# Altium PCB DSP大板子.PcbDoc (part 1 of 9)
Units mil, origin at the board's own origin, x right, y up, seen from the top; angles counter-clockwise.
Board outline 7874.02 x 9055.12 mil, 4 copper layers (Top Layer, GND02, PWR03, Bottom Layer), stack 23.756 mil thick; 656 components, 360 nets, 1967 pads, 2623 vias.
Unrouted connection lines stored in the file: 70.
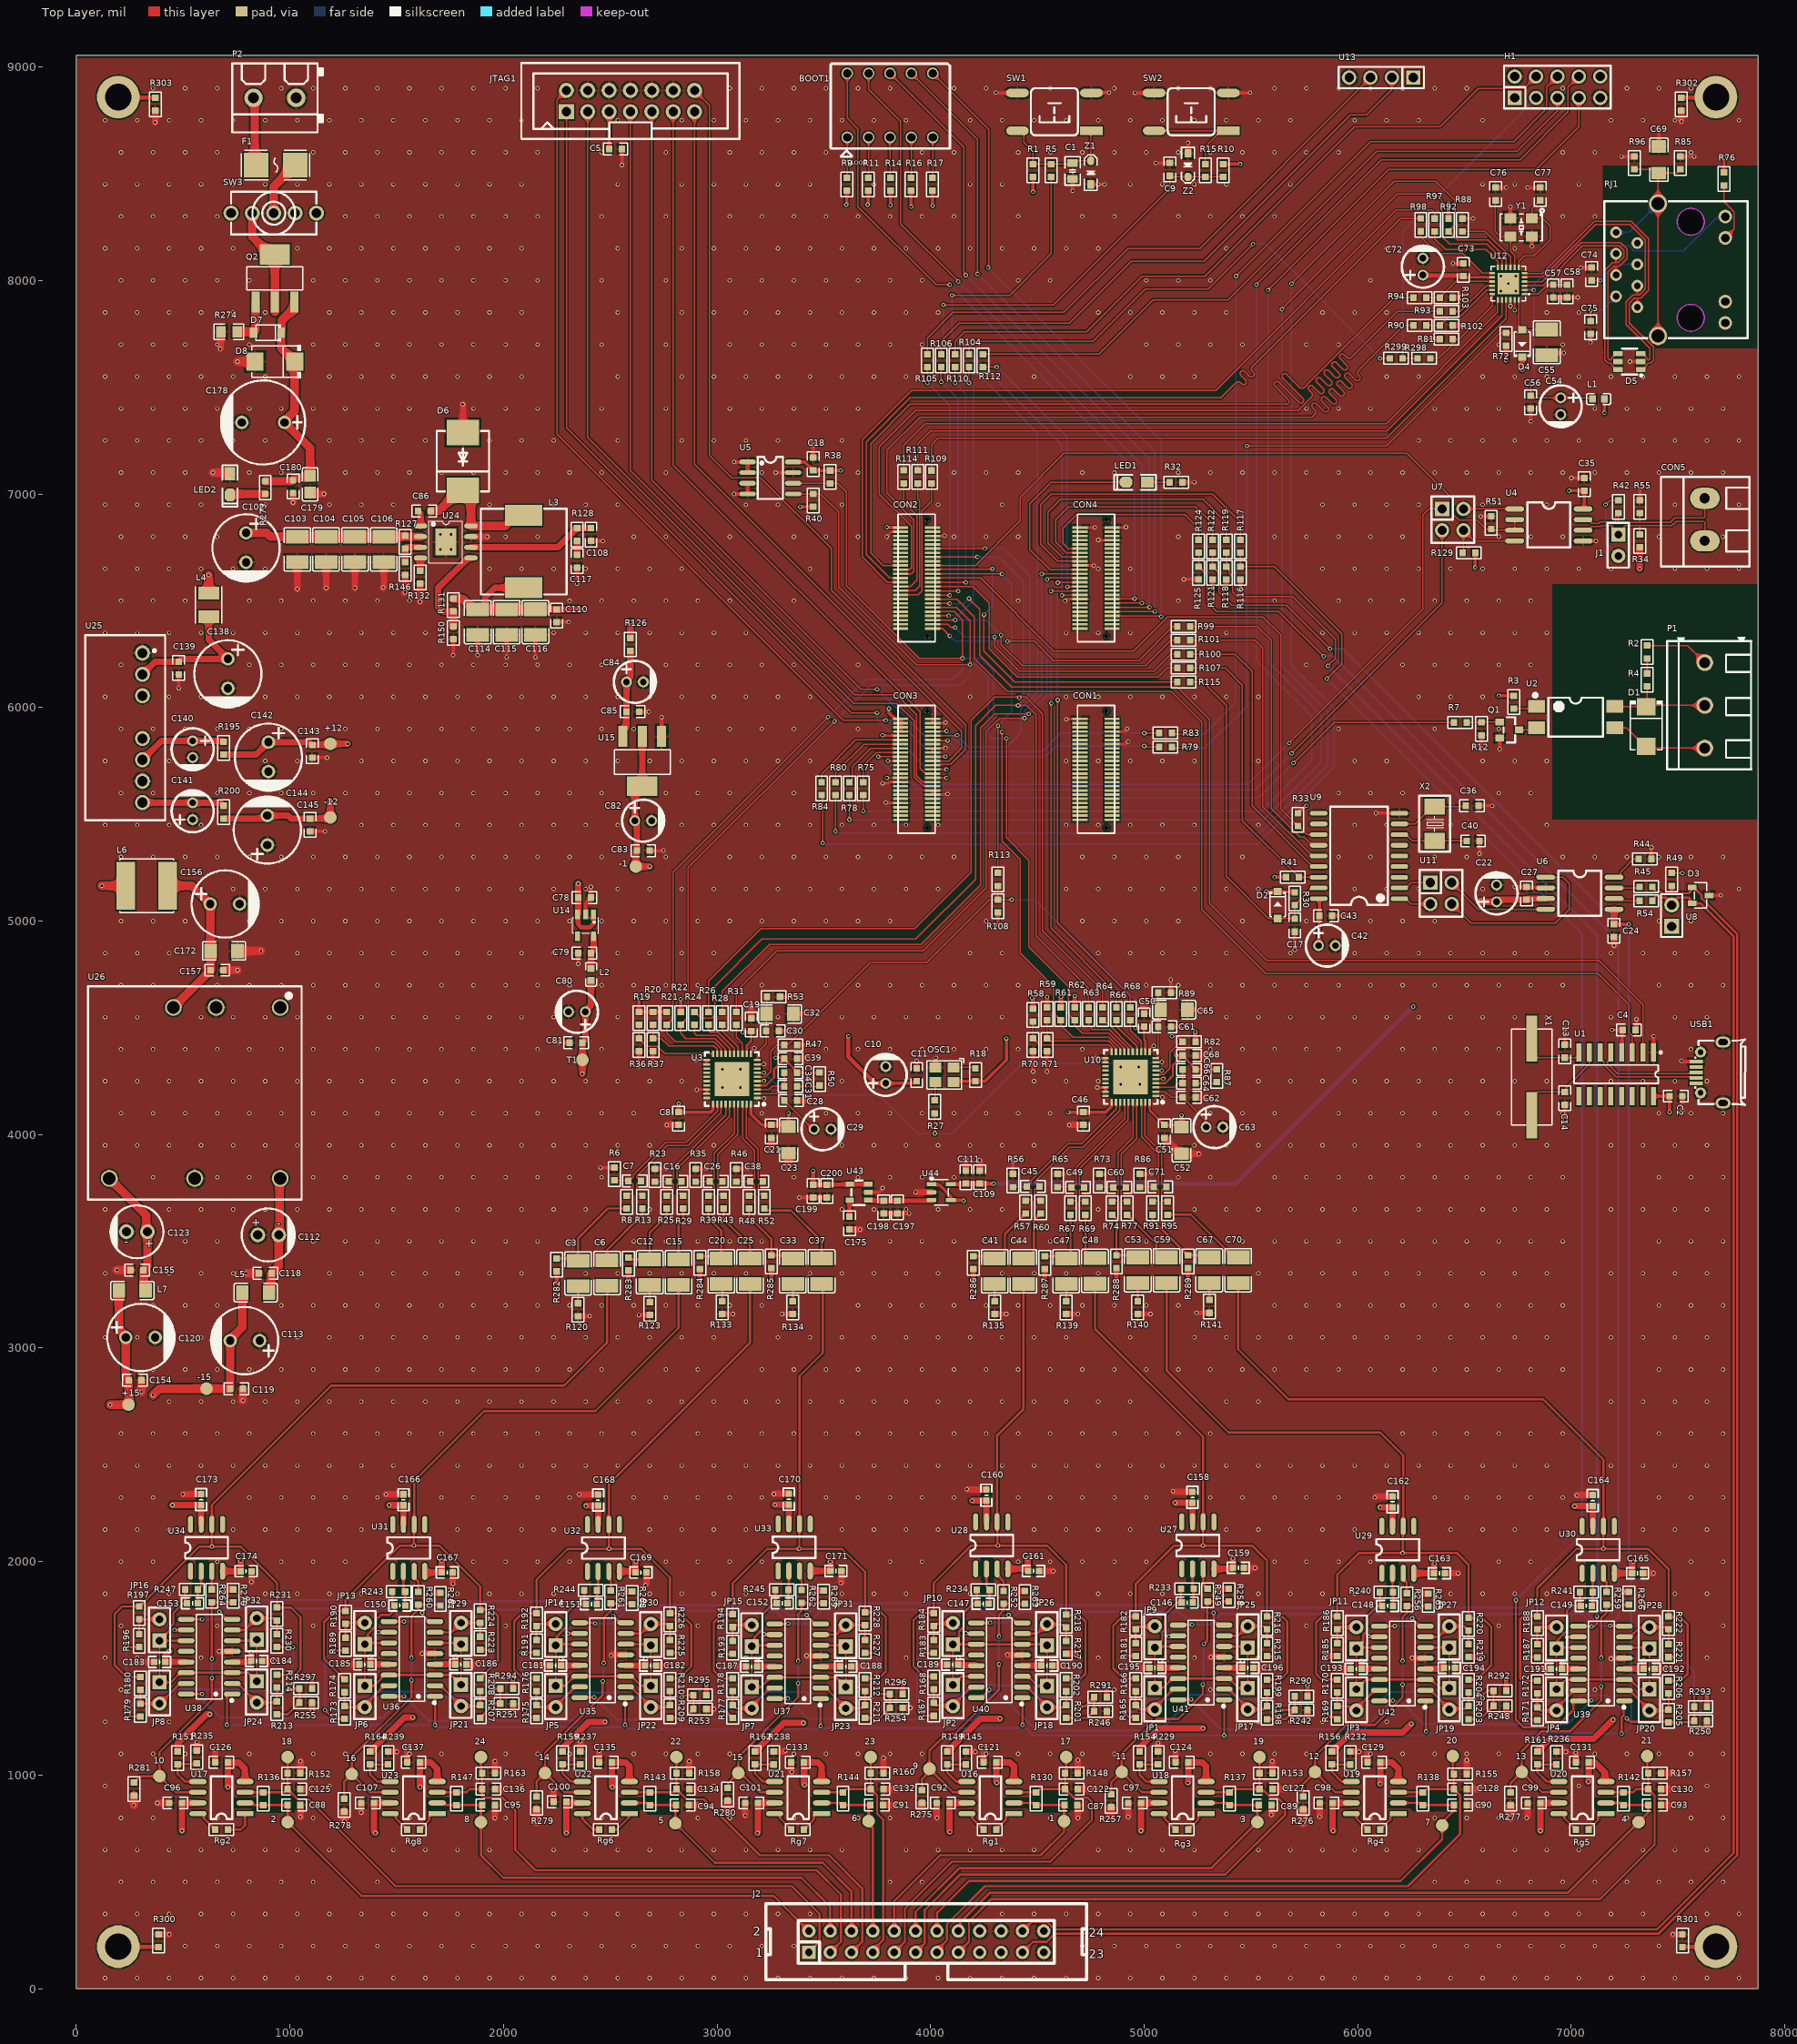
[diagram p0: Top Layer view]
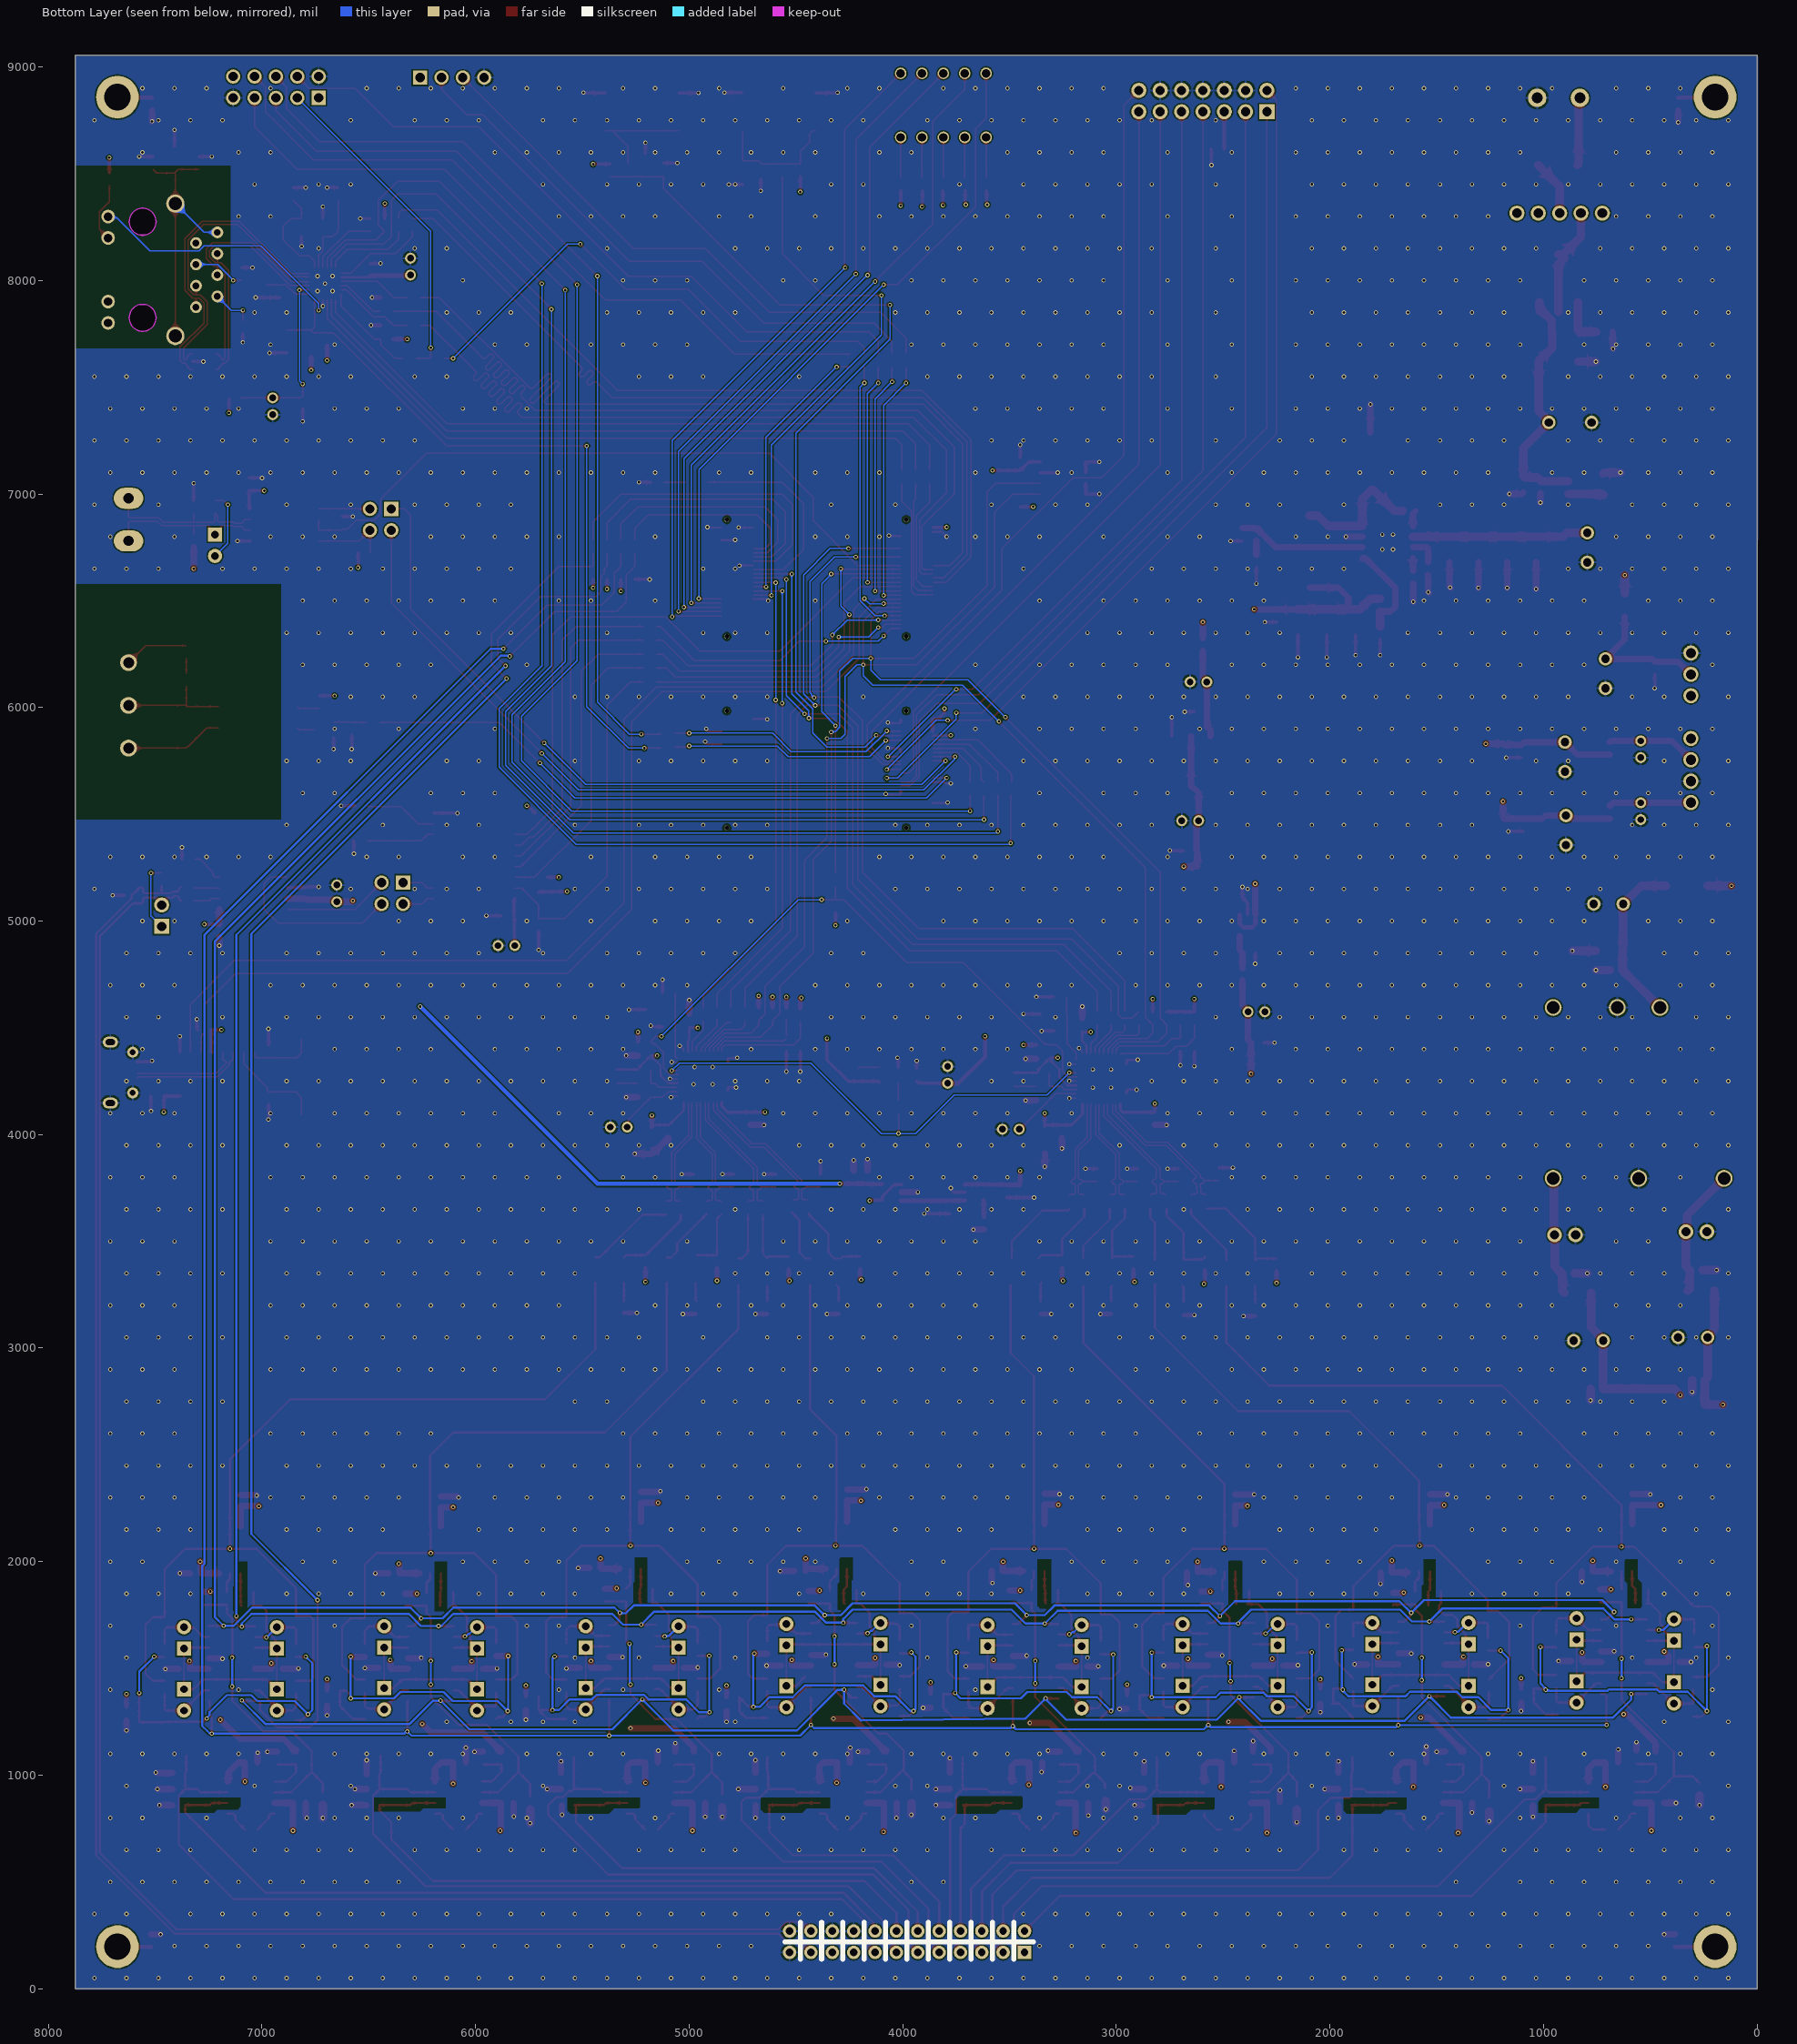
[diagram p1: Bottom Layer view, seen from below]
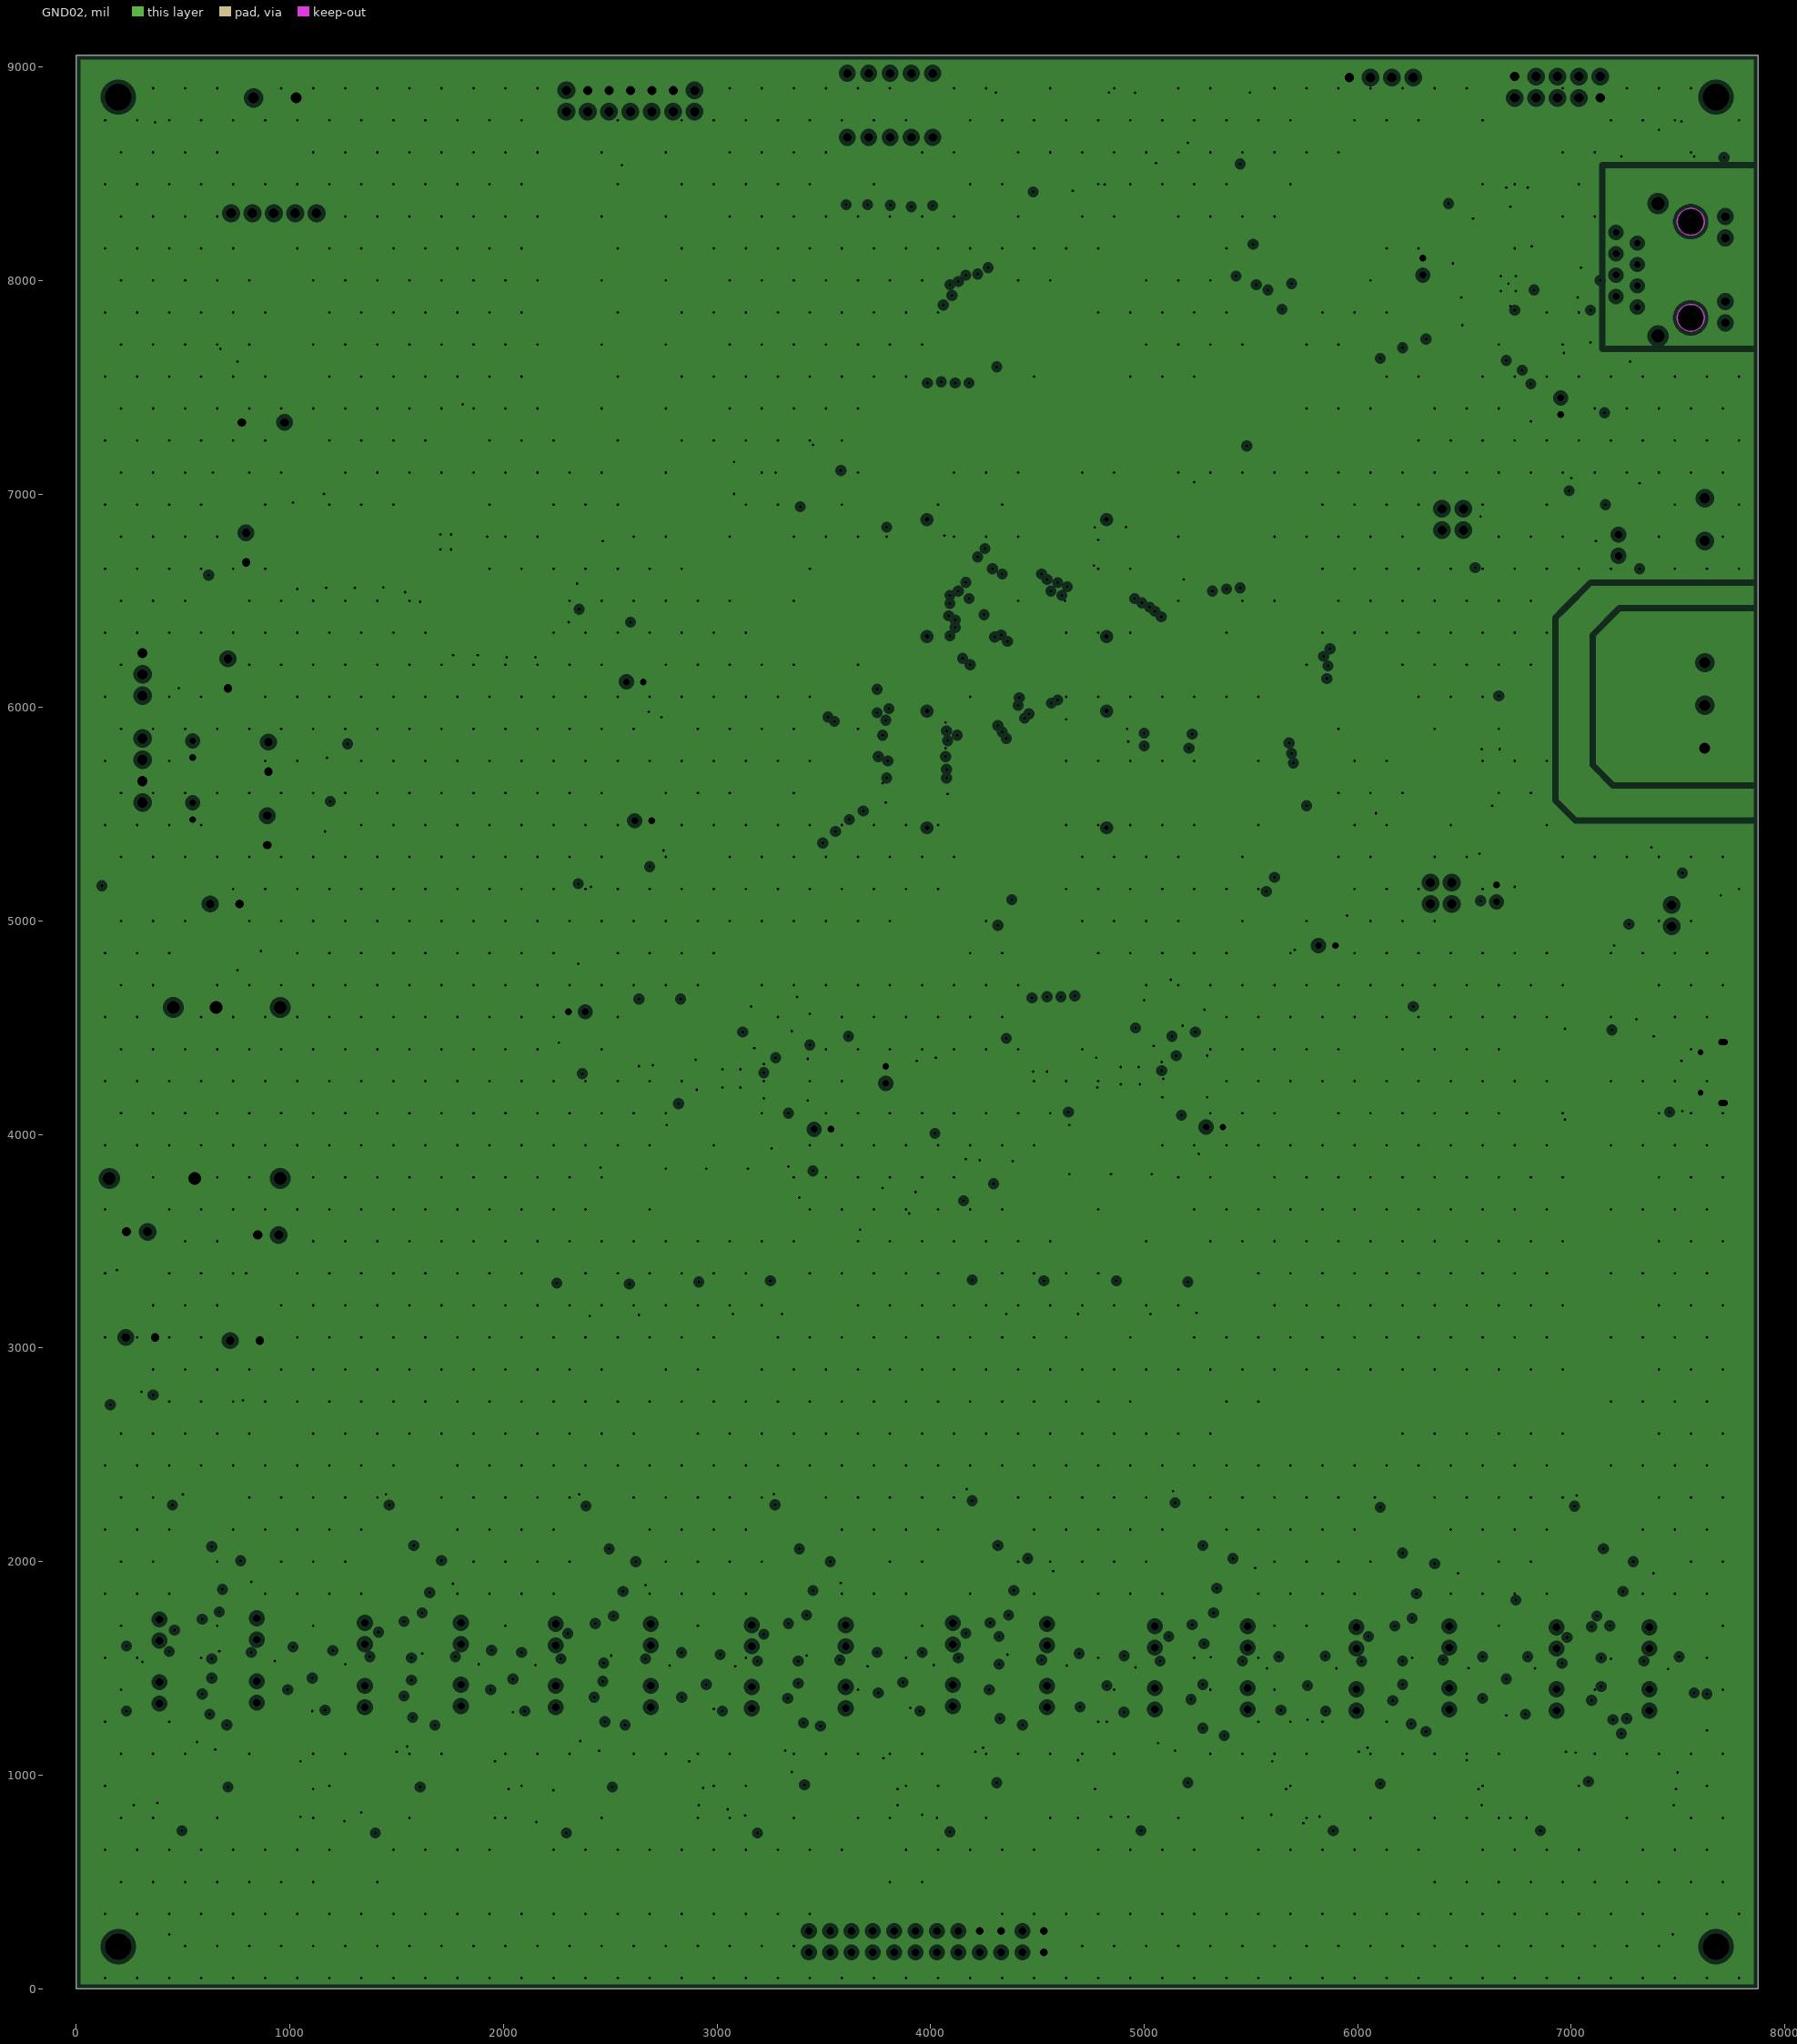
[diagram p2: GND02, clearances drawn from the general rule]
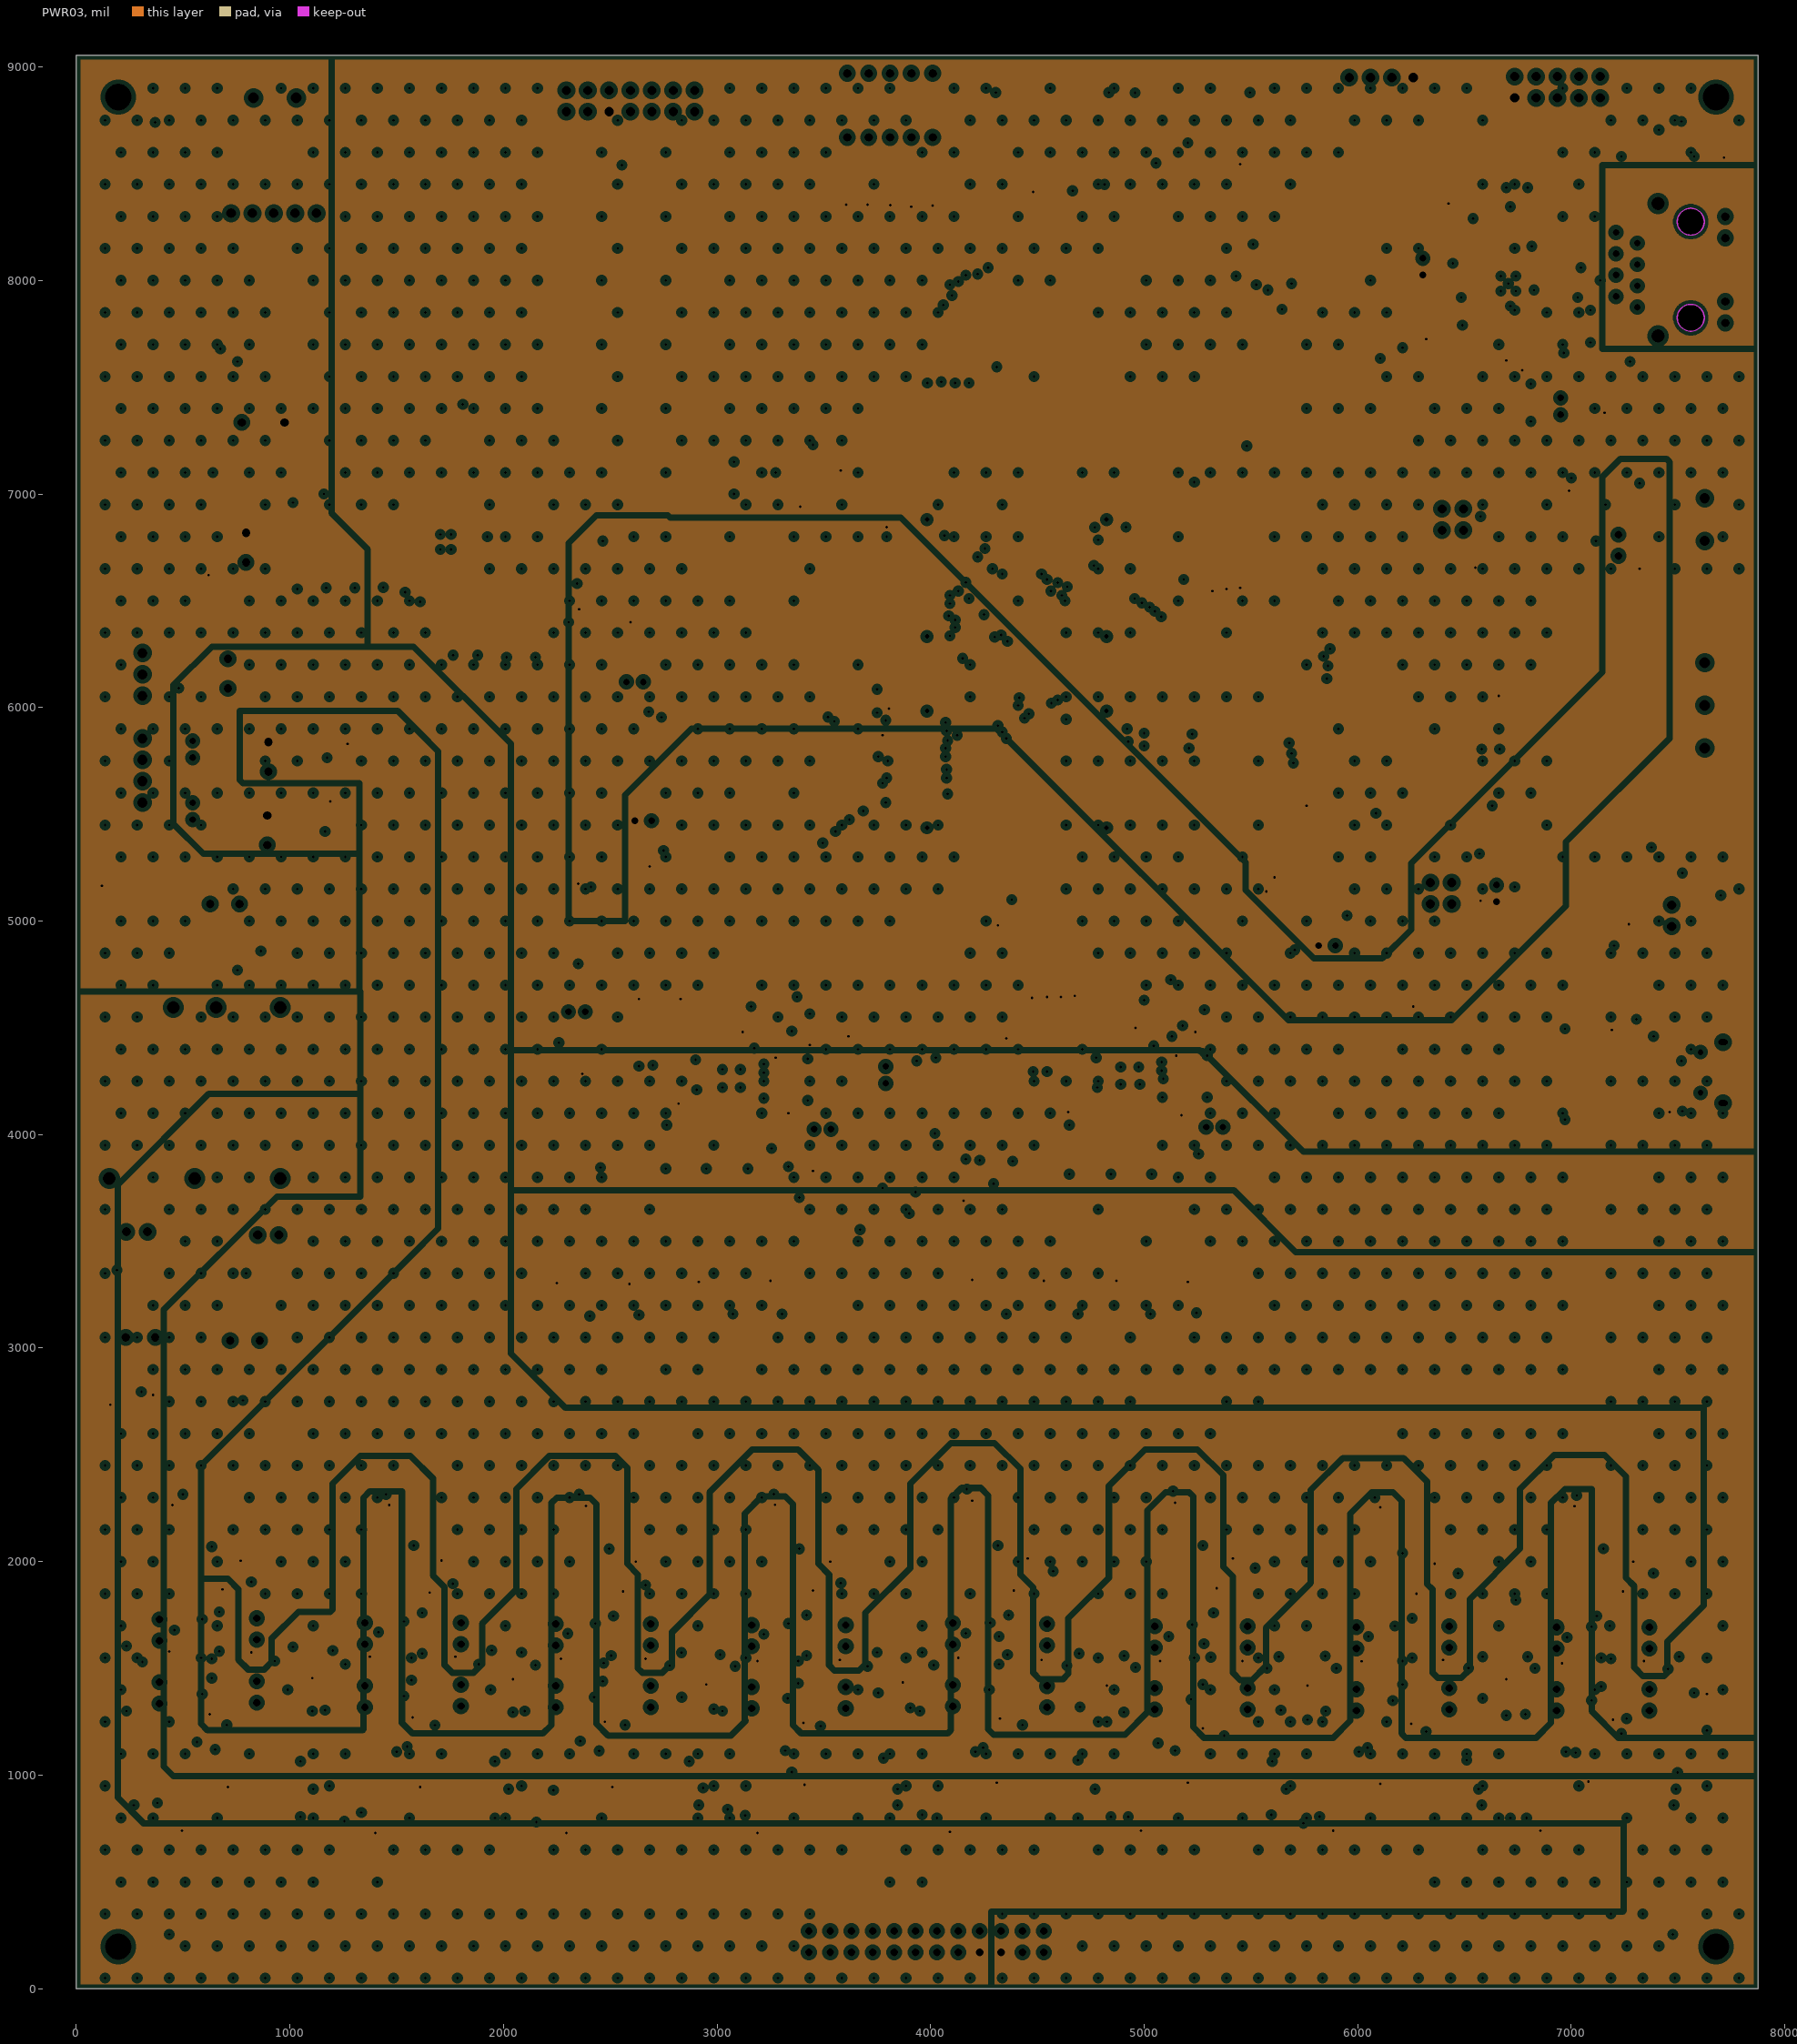
[diagram p3: PWR03, clearances drawn from the general rule]

## Layer stack, top to bottom
Top Solder: solder mask 0.4, Solder Resist, Dk 3.5
Top Layer: signal copper 1.4
Dielectric 2: prepreg 2.8, PP-006, Dk 4.1
GND02: plane copper 1.378, net (Multiple Nets)
Dielectric 1: dielectric 12.6, FR-4, Dk 4.8
PWR03: plane copper 1.378, net (Multiple Nets)
Dielectric 3: prepreg 2.8, PP-006, Dk 4.1
Bottom Layer: signal copper 1.4
Bottom Solder: solder mask 0.4, Solder Resist, Dk 3.5

## Board outline
0,0 7874.02,0 7874.02,9055.12 0,9055.12

## Design rules (kind name [scope] priority, off if disabled: settings)
Clearance [All] p1: gap=6 ignorepadtopadclearanceinfootprint=TRUE except(10: Arc-Hole Track-Hole SMDPad-Hole THPad-Hole Via-Hole Fill-Hole Poly-Hole Region-Hole Text-Hole)
ComponentClearance [All] p1: gap=0 collisioncheckmode=3 verticalgap=0 showdistances=FALSE
DiffPairsRouting [All] p1: maxlimit=10 minlimit=10 mostfreqgap=10 toplayer_minwidth=6 toplayer_maxwidth=15 toplayer_prefwidth=15 bottomlayer_minwidth=6 bottomlayer_maxwidth=15 bottomlayer_prefwidth=15 maxuncoupledlength=500
HoleSize [All] p1: absolutevalues=TRUE maxlimit=100 minlimit=12 maxpercent=80.000 minpercent=20.000
HoleToHoleClearance [All] p1: gap=0 allowstackedmicrovias=TRUE
MinimumSolderMaskSliver [All] p1: minsoldermaskwidth=0
PlaneClearance [All] p1: clearance=20
PlaneConnect [All] p1: planeconnectstyle=Relief reliefexpansion=20 reliefentries=4 reliefconductorwidth=10 reliefairgap=10
PolygonConnect [All] p1: thpad.connectstyle=Relief thpad.reliefconductorwidth=10 thpad.reliefentries=4 thpad.polygonreliefangle="90 Angle" thpad.airgapwidth=10 smdpad.connectstyle=Relief smdpad.reliefconductorwidth=10 smdpad.reliefentries=4 smdpad.polygonreliefangle="90 Angle" smdpad.airgapwidth=10 via.connectstyle=Direct via.reliefconductorwidth=10 via.reliefentries=4 via.polygonreliefangle="90 Angle" via.airgapwidth=10
RoutingVias [All] p1: holewidth=12 width=20 viastyle="Through Hole" minholewidth=12 minwidth=20 maxholewidth=28 maxwidth=50
SilkToSilkClearance [All] p1: silktosilkclearance=0
SilkToSolderMaskClearance [IsPad] p1: minsilkscreentomaskgap=0 clearancetoexposedcopper=TRUE
SolderMaskExpansion [All] p1: expansion=4 istentingtop=FALSE
SupplyNets "Schematic Supply Nets_9" [InNet('VBIAS_1V5_RAW')] p1: voltage=0.000
SupplyNets "Schematic Supply Nets_4" [InNet('VBIAS_1V5')] p2: voltage=0.000
SupplyNets "Schematic Supply Nets_8" [InNet('GND')] p3: voltage=0.000
SupplyNets "Schematic Supply Nets_7" [InNet('+15V')] p4: voltage=0.000
SupplyNets "Schematic Supply Nets_6" [InNet('+5V_SYS')] p5: voltage=0.000
SupplyNets "Schematic Supply Nets_5" [InNet('-12V')] p6: voltage=0.000
SupplyNets "Schematic Supply Nets_3" [InNet('AVDD')] p7: voltage=0.000
SupplyNets "Schematic Supply Nets_2" [InNet('-15V')] p8: voltage=0.000
SupplyNets "Schematic Supply Nets_1" [InNet('IOVDD')] p9: voltage=0.000
SupplyNets "Schematic Supply Nets" [InNet('+12V')] p10: voltage=0.000
UnRoutedNet [All] p1: checkbadconnections=TRUE
Width [All] p1: maxlimit=300 minlimit=6 preferedwidth=10
20 further rules are at their usual default settings.

## Classes and differential pairs
differential pair AIN8: +AIN8_P -AIN8_N
differential pair AIN7: +AIN7_P -AIN7_N
differential pair AIN6: +AIN6_P -AIN6_N
differential pair AIN5: +AIN5_P -AIN5_N
differential pair AIN4: +AIN4_P -AIN4_N
differential pair AIN3: +AIN3_P -AIN3_N
differential pair AIN2: +AIN2_P -AIN2_N
differential pair AIN1: +AIN1_P -AIN1_N

## Components (designator, comment, footprint, x,y, rotation, side; value= is the part's Value field where it differs from the comment)
1 "TEST POINT" TEST 4625,785 r90 top
2 "TEST POINT" TEST 990,780 r90 top
3 "TEST POINT" TEST 5530,780 r90 top
4 "TEST POINT" TEST 7315,780 r90 top
5 "TEST POINT" TEST 2805,775 r90 top
6 "TEST POINT" TEST 3710,785 r90 top
7 "TEST POINT" TEST 6395,765 r270 top
8 "TEST POINT" TEST 1895,780 r90 top
9 "TEST POINT" TEST 3995,1030 r90 top
10 "TEST POINT" TEST 390,995 r0 top
11 "TEST POINT" TEST 4895,1015 r0 top
12 "TEST POINT" TEST 5800,1015 r0 top
13 "TEST POINT" TEST 6767.76,1015 r0 top
14 "TEST POINT" TEST 2195,1010 r0 top
15 "TEST POINT" TEST 3100,1010 r0 top
16 "TEST POINT" TEST 1290,1005 r0 top
17 "TEST POINT" TEST 4635,1085 r0 top
18 "TEST POINT" TEST 990,1085 r0 top
19 "TEST POINT" TEST 5540,1085 r0 top
20 "TEST POINT" TEST 6445,1090 r0 top
21 "TEST POINT" TEST 7355,1090 r0 top
22 "TEST POINT" TEST 2810,1085 r0 top
23 "TEST POINT" TEST 3720,1085 r0 top
24 "TEST POINT" TEST 1895,1085 r0 top
+12 "TEST POINT" TEST 1190,5830 r90 top
+15 "TEST POINT" TEST 245,2735 r90 top
-1 "TEST POINT" TEST 2620,5255 r270 top
-12 "TEST POINT" TEST 1190,5485 r90 top
-15 "TEST POINT" TEST 610,2810 r90 top
BOOT1 "5BIT 2.54MM DIP Switch" CON_5PIN_DIP_2D54 3812,8814 r180 top
C1 "0.1uF" "C 0805_L" 4665,8512.6 r90 top
C2 "0.1uf" 0603C 7489.92,4180 r0 top
C3 "10uF" C1210 2350,3350 r270 top
C4 "0.1uf" 0603C 7270,4490 r0 top
C5 "0.1uf" 0603C 2525,8615 r0 top
C6 "10uF/0Ω" C1210 2485.31,3351.35 r90 top value=10uF
C7 "DNP" 0603C 2615,3782.78 r180 top
C8 "0.1uf" 0603C 2820,4075 r90 top
C9 "DNP_10nF" 0603C 5120,8519.92 r270 top
C10 "10uF" 5x11mm 3790,4280 r90 top
C11 "0.1uf" 0603C 3935,4280 r270 top
C12 "10uF" C1210 2685,3355 r270 top
C13 "22pf" 0603C 6970,4389.92 r270 top
C14 "22pf" 0603C 6970,4170 r90 top
C15 "10uF/0Ω" C1210 2820,3355.3 r270 top value=10uF
C16 "DNP" 0603C 2804.92,3780 r180 top
C17 "0.1uF" 0603C 5705,4979.92 r90 top
C18 "0.1uf" 0603C 3450,7139.92 r90 top
C19 "0.1uf" 0603C 3160,4515 r90 top
C20 "10uF" C1210 3019.84,3360 r270 top
C21 "0.1uf" 0603C 3255,4014.92 r90 top
C22 "10u" 5x11mm 6650,5130 r90 top
C23 "10uF" C1206#1 3335,3975 r90 top
C24 "0.1u" 0603C 7200,4955 r270 top value=104
C25 "10uF/0Ω" C1210 3155.1,3360 r270 top value=10uF
C26 "DNP" 0603C 2994.92,3780 r180 top
C27 "0.1u" 0603C 6790,5129.92 r90 top value=104
C28 "0.1uf" 0603C 3345.08,4160 r0 top
C29 "10uF" 5x11mm 3495,4025 r0 top
C30 "0.1uf" 0603C 3260,4485 r180 top
C31 "5600pf" 0603C 3345,4225 r0 top
C32 "10uF" C1206#1 3295,4565 r180 top
C33 "10uF" C1210 3354.84,3360 r270 top
C34 "390pf" 0603C 3345,4290 r0 top
C35 "0.1uF" 0603C 7060,7045 r270 top
C36 "33pF" 0603C 6534.92,5540 r0 top
C37 "10uF/0Ω" C1210 3489.61,3360 r270 top value=10uF
C38 "DNP" 0603C 3184.76,3780 r180 top
C39 "0.1uf" 0603C 3345,4355 r0 top
C40 "33pF" 0603C 6540,5375 r0 top
C41 "10uF" C1210 4300,3360 r270 top
C42 "10u" 5x11mm 5856.26,4885 r0 top
C43 "0.1u" 0603C 5850.08,5025 r0 top value=104
C44 "10uF/0Ω" C1210 4435,3360 r270 top value=10uF
C45 "DNP" 0603C 4479.78,3757.78 r180 top
C46 "0.1uf" 0603C 4715,4075 r270 top
C47 "10uF" C1210 4635,3360 r270 top
C48 "10uF/0Ω" C1210 4770,3361.43 r270 top value=10uF
C49 "DNP" 0603C 4689.57,3752.78 r180 top
C50 "0.1uf" 0603C 5000,4534.92 r90 top
C51 "0.1uf" 0603C 5095,4014.92 r270 top
C52 "10uF" C1206#1 5175,3972.7 r90 top
C53 "10uF" C1210 4970,3365 r270 top
C54 "22u" 5x11mm 6950,7410 r270 top
C55 "10uF" C1210 6885,7710.2 r90 top
C56 "0.1u" 0603C 6810,7430 r270 top value=104
C57 "2.2u" 0603C 6915,7949.92 r90 top value=104
C58 "0.1u" 0603C 6980,7950 r90 top value=104
C59 "10uF/0Ω" C1210 5105,3365 r270 top value=10uF
C60 "DNP" 0603C 4884.57,3752.78 r180 top
C61 "0.1uf" 0603C 5095,4505 r180 top
C62 "0.1uf" 0603C 5210,4175 r0 top
C63 "10uF" 5x11mm 5330,4035 r0 top
C64 "5600pf" 0603C 5210,4240 r0 top
C65 "10uF" C1206#1 5140,4585 r180 top
C66 "390pf" 0603C 5210,4305 r0 top
C67 "10uF" C1210 5305,3365 r270 top
C68 "0.1uf" 0603C 5210,4370 r0 top
C69 "1nF/2kV" C1206#1 7410,8565 r270 top value=10uF
C70 "10uF/0Ω" C1210 5440,3365 r270 top value=10uF
C71 "DNP" 0603C 5075,3755 r180 top
C72 "22u" 5x11mm 6305,8065 r90 top
C73 "0.1u" 0603C 6495,8050 r90 top value=104
C74 "0.1u" 0603C 7095,8030 r90 top value=104
C75 "0.1u" 0603C 7090,7780.08 r270 top value=104
C76 "18pF" 0603C 6645,8404.92 r270 top
C77 "18pF" 0603C 6854.64,8404.92 r270 top
C78 "4.7uf" 0603C 2380,5110 r180 top
C79 "4.7uf" 0603C 2380,4850 r0 top
C80 "10uF" 5x11mm 2343.74,4575 r180 top
C81 "0.1uf" 0603C 2340,4430 r0 top
C82 "10u" 5x11mm 2655,5470 r0 top
C83 "0.1u" 0603C 2654.92,5330 r0 top value=104
C84 "10u" 5x11mm 2616.26,6120 r0 top
C85 "0.1u" 0603C 2605.08,5980 r0 top value=104
C86 "0.1uf" 0603C 1630.08,6920 r0 top
C87 "104" 0603C 4657.1,860 r0 top
C88 "104" 0603C 1020,860 r0 top
C89 "104" 0603C 5566.37,860 r0 top
C90 "104" 0603C 6480,860 r0 top
C91 "104" 0603C 3747.82,860 r0 top
C92 "104" 0603C 4058.53,870 r180 top
C93 "104" 0603C 7390.08,860 r0 top
C94 "104" 0603C 2838.55,860 r0 top
C95 "104" 0603C 1930,860 r0 top
C96 "104" 0603C 465,870 r180 top
C97 "104" 0603C 4955.66,870 r180 top
C98 "104" 0603C 5852.79,870 r180 top
C99 "104" 0603C 6824.92,870 r180 top
C100 "104" 0603C 2264.26,875 r180 top
C101 "104" 0603C 3161.39,870 r180 top
C102 "47uF" CAP-TH_BD8.0-P3.50-D0.6-FD 795,6748.9 r270 top
C103 "2.2uF" C1210 1035,6740 r270 top
C104 "2.2uF" C1210 1170,6740 r270 top
C105 "2.2uF" C1210 1305,6740 r270 top
C106 "2.2uF" C1210 1440,6740 r270 top
C107 "104" 0603C 1365,870 r180 top
C108 "47pf" 0603C 2410,6809.92 r90 top
C109 "100nf" 0603C 4230,3800 r270 top
C110 "0.1uf" 0603C 2250,6430.08 r90 top
C111 "1uf" 0603C 4165,3800 r270 top
C112 "10uF" CAP-TH_BD6.3-P2.50-D0.6-FD 899.21,3530 r0 top
C113 "100uF" CAP-TH_BD8.0-P3.50-D0.6-FD_1 790,3035 r180 top
C114 "47uF" C1210 1880,6399.8 r270 top value=2.2uF
C115 "47uF" C1210 2015,6400 r270 top value=2.2uF
C116 "47uF" C1210 2150,6400.3 r270 top value=2.2uF
C117 "4.7nf" 0603C 2345,6684.92 r90 top
C118 "0.1uf" 0603C 885,3350 r180 top
C119 "0.1uf" 0603C 750,2810 r0 top
C120 "100uF" CAP-TH_BD8.0-P3.50-D0.6-FD_1 301.1,3050 r0 top
C121 "104" 0603C 4277.19,1060 r0 top
C122 "104" 0603C 4659.95,935 r180 top
C123 "10uF" CAP-TH_BD6.3-P2.50-D0.6-FD 284.21,3545 r180 top
C124 "104" 0603C 5176.48,1060 r0 top
C125 "104" 0603C 1020,935 r180 top
C126 "104" 0603C 680,1060 r0 top
C127 "104" 0603C 5569.94,935 r180 top
C128 "104" 0603C 6479.93,935 r180 top
C129 "104" 0603C 6075.78,1060 r0 top
C130 "104" 0603C 7389.92,935 r180 top
C131 "104" 0603C 7050.61,1060 r0 top
C132 "104" 0603C 3749.97,935 r180 top
C133 "104" 0603C 3377.89,1060 r0 top
C134 "104" 0603C 2839.98,935 r180 top
C135 "104" 0603C 2478.59,1060 r0 top
C136 "104" 0603C 1929.99,935 r180 top
C137 "104" 0603C 1579.3,1060 r0 top
C138 "100uF" CAP-TH_BD8.0-P3.50-D0.6-FD 710,6158.9 r270 top
C139 "0.1uf" 0603C 480,6185 r270 top
C140 "10u" 5x11mm 545,5803.74 r270 top
C141 "10u" 5x11mm 545,5515 r90 top
C142 "47uF" CAP-TH_BD8.0-P3.50-D0.6-FD 900,5768.9 r270 top
C143 "0.1uf" 0603C 1105,5795 r270 top
C144 "47uF" CAP-TH_BD8.0-P3.50-D0.6-FD 895,5425 r90 top
C145 "0.1uf" 0603C 1095,5449.92 r270 top
C146 "404" "C 0603_L" 5201.42,1808.23 r180 top
C147 "404" "C 0603_L" 4246.27,1803.23 r180 top
C148 "404" "C 0603_L" 6139.9,1792.93 r180 top
C149 "404" "C 0603_L" 7070.01,1793.01 r180 top
C150 "404" "C 0603_L" 1515,1795 r180 top
C151 "404" "C 0603_L" 2412.89,1800.54 r180 top
C152 "404" "C 0603_L" 3305.6,1805 r180 top
C153 "404" "C 0603_L" 545,1805.08 r180 top
C154 "0.1uf" 0603C 275,2850 r180 top
C155 "0.1uf" 0603C 284.92,3365 r0 top
C156 "100uF" CAP-TH_BD8.0-P3.50-D0.6-FD_1 696.1,5080 r0 top
C157 "0.1uf" 0603C 660,4770 r0 top
C158 "104" "C 0603_L" 5226.48,2301.09 r270 top
C159 "104" "C 0603_L" 5441.48,1971.09 r180 top
C160 "104" "C 0603_L" 4261.62,2311.09 r270 top
C161 "104" "C 0603_L" 4481.62,1956.09 r180 top
C162 "104" "C 0603_L" 6162.82,2280.62 r270 top
C163 "104" "C 0603_L" 6382.82,1945.62 r180 top
C164 "104" "C 0603_L" 7100.61,2285.62 r270 top
C165 "104" "C 0603_L" 7310.01,1945.62 r180 top
C166 "104" "C 0603_L" 1531.93,2289.67 r270 top
C167 "104" "C 0603_L" 1736.93,1949.07 r180 top
C168 "104" "C 0603_L" 2443.44,2288.47 r270 top
C169 "104" "C 0603_L" 2643.44,1949.07 r180 top
C170 "104" "C 0603_L" 3336.39,2292.01 r270 top
C171 "104" "C 0603_L" 3556.99,1956.41 r180 top
C172 "4.7uF" C1206#2 692.3,4860 r180 top
C173 "104" "C 0603_L" 585,2290.08 r270 top
C174 "104" "C 0603_L" 795,1955.08 r180 top
C175 "100nf" 0603C 3620,3584.92 r270 top
C178 "220uF" CAP-TH_BD10.0-P5.00-D1.0-FD 875,7335 r180 top
C179 "1uF" C0805 1095,7045 r90 top
C180 "0.1uf" 0603C 1015,7035 r270 top
C181 "104" "C 0603_L" 2244.35,1513.53 r0 top
C182 "104" "C 0603_L" 2689.35,1513.53 r180 top
C183 "104" "C 0603_L" 390,1530 r0 top
C184 "104" "C 0603_L" 844.4,1535 r180 top
C185 "104" "C 0603_L" 1350.63,1518.63 r0 top
C186 "104" "C 0603_L" 1800.63,1518.63 r180 top
C187 "104" "C 0603_L" 3162.3,1508.17 r0 top
C188 "104" "C 0603_L" 3602.9,1508.17 r180 top
C189 "104" "C 0603_L" 4104.16,1517.85 r0 top
C190 "104" "C 0603_L" 4544.76,1512.85 r180 top
C191 "104" "C 0603_L" 6930.6,1497.62 r0 top
C192 "104" "C 0603_L" 7365,1497.62 r180 top
C193 "104" "C 0603_L" 5992.93,1497.7 r0 top
C194 "104" "C 0603_L" 6428.53,1502.7 r180 top
C195 "104" "C 0603_L" 5050.07,1502.85 r0 top
C196 "104" "C 0603_L" 5485.07,1502.85 r180 top
C197 "100nf" 0603C 3845,3660 r90 top
C198 "1uf" 0603C 3780,3660 r90 top
C199 "1uf" 0603C 3450,3734.92 r90 top
C200 "100nf" 0603C 3515,3735 r90 top
CON1 "" NLWBS05-50C-2.2H 15647.8,27106.3 r180 top
CON2 "" NLWBS05-50C-2.2H 14807.64,28002.36 r180 top
CON3 "" NLWBS05-50C-2.2H 14807.64,27106.3 r180 top
CON4 "" NLWBS05-50C-2.2H 15647.8,28002.36 r180 top
CON5 "HDR-1X2" KF128-5.08-2P 7625,6880 r90 top
D1 "smbj33a_c224019" SMB_L4.6-W3.6-LS5.3-RD 7350,5910 r270 top
D2 "1n4148w_c7420318" SOD-123_L2.7-W1.6-LS3.7-FD 5625,5075 r90 top
D3 "pesd2can,215" SOT-23-3_L2.9-W1.3-P1.90-LS2.4-BR 7605,5120 r180 top
D4 "1n4148w_c7420318" SOD-123_L2.7-W1.6-LS3.7-FD 6770,7705 r270 top
D5 "tpd4e1u06dbvr" SOT-23-6_L2.9-W1.6-P0.95-LS2.8-BR 7271.85,7620 r0 top
D6 "b560c-13-f" SMC_L7.1-W6.2-LS8.1-RD 1810.58,7152.96 r90 top
D7 "bzt52c12-7-f" SOD-123_L2.7-W1.6-LS3.7-RD 895,7755 r180 top
D8 "smbj33a_c224019" SMB_L4.6-W3.6-LS5.3-RD 930,7620 r180 top
F1 "0451003.mrl" FUSE-SMD_L6.1-W2.7 933.27,8540 r0 top
H1 "a254up-zs05p" HDR-TH_10P-P2.54-V-M-R2-C5-S2.54 6935,8905 r0 top
J1 "1X2PIN" HDR2.54-Y-LI-2P 7220,6760 r270 top
J2 "Header 2X12" IDC2.54-LI-2x12P 3430,170 r0 top
JP1 "HDR-1X2" HDR2.54-Y-LI-2P 5050.07,1357.85 r270 top
JP2 "HDR-1X2" HDR2.54-Y-LI-2P 4104.76,1372.85 r270 top
JP3 "HDR-1X2" HDR2.54-Y-LI-2P 5993.53,1352.7 r270 top
JP4 "HDR-1X2" HDR2.54-Y-LI-2P 6930.6,1352.62 r270 top
JP5 "HDR-1X2" HDR2.54-Y-LI-2P 2244.95,1368.53 r270 top
JP6 "HDR-1X2" HDR2.54-Y-LI-2P 1351.23,1368.63 r270 top
JP7 "HDR-1X2" HDR2.54-Y-LI-2P 3162.9,1363.17 r270 top
JP8 "HDR-1X2" HDR2.54-Y-LI-2P 390,1385 r270 top
JP9 "HDR-1X2" HDR2.54-Y-LI-2P 5050.07,1647.85 r90 top
JP10 "HDR-1X2" HDR2.54-Y-LI-2P 4104.76,1662.85 r90 top
JP11 "HDR-1X2" HDR2.54-Y-LI-2P 5993.53,1642.7 r90 top
JP12 "HDR-1X2" HDR2.54-Y-LI-2P 6930.6,1642.62 r90 top
JP13 "HDR-1X2" HDR2.54-Y-LI-2P 1351.23,1663.63 r90 top
JP14 "HDR-1X2" HDR2.54-Y-LI-2P 2244.95,1658.53 r90 top
JP15 "HDR-1X2" HDR2.54-Y-LI-2P 3162.9,1653.17 r90 top
JP16 "HDR-1X2" HDR2.54-Y-LI-2P 390,1680 r90 top
JP17 "HDR-1X2" HDR2.54-Y-LI-2P 5485.07,1357.85 r270 top
JP18 "HDR-1X2" HDR2.54-Y-LI-2P 4544.76,1367.85 r270 top
JP19 "HDR-1X2" HDR2.54-Y-LI-2P 6428.53,1357.7 r270 top
JP20 "HDR-1X2" HDR2.54-Y-LI-2P 7365.6,1352.62 r270 top
JP21 "HDR-1X2" HDR2.54-Y-LI-2P 1801.23,1373.63 r270 top
JP22 "HDR-1X2" HDR2.54-Y-LI-2P 2689.95,1368.53 r270 top
JP23 "HDR-1X2" HDR2.54-Y-LI-2P 3602.9,1363.17 r270 top
JP24 "HDR-1X2" HDR2.54-Y-LI-2P 845,1390 r270 top
JP25 "HDR-1X2" HDR2.54-Y-LI-2P 5485.07,1647.85 r90 top
JP26 "HDR-1X2" HDR2.54-Y-LI-2P 4544.76,1657.85 r90 top
JP27 "HDR-1X2" HDR2.54-Y-LI-2P 6428.53,1647.7 r90 top
JP28 "HDR-1X2" HDR2.54-Y-LI-2P 7365.6,1642.62 r90 top
JP29 "HDR-1X2" HDR2.54-Y-LI-2P 1801.23,1663.63 r90 top
JP30 "HDR-1X2" HDR2.54-Y-LI-2P 2689.95,1658.53 r90 top
JP31 "HDR-1X2" HDR2.54-Y-LI-2P 3602.9,1653.17 r90 top
JP32 "HDR-1X2" HDR2.54-Y-LI-2P 845,1685 r90 top
JTAG1 "" IDC-TH_14P-P2.54-V-R2-C7-S2.54 2595,8840 r0 top
L1 "blm18kg601sn1d" L0603 7127.5,7445 r0 top
L2 "mpz1608s221ata00" L0603 2410,4750 r270 top
L3 "7.2µH" IND-SMD_L10.2-W10.2_7447798720 2095,6730 r270 top value=7.2uH
L4 "4.7uH" 1210L 620,6480 r270 top value="15uH   0.6A"
L5 "blm31pg121sn1l" L1206 840,3260 r180 top
L6 "srn6045ta-4r7m" IND-SMD_L6.0-W6.0 330,5165 r0 top value=4.7uH
L7 "blm31pg121sn1l" L1206 262.3,3270 r180 top
LED1 "LED" "LED 0805R" 4965,7055 r180 top
LED2 "LED" "LED 0805R" 720,7045 r270 top
OSC1 "ot2el4c4ji-111olp-24.576m" OSC-SMD_4P-L3.2-W2.5-BL 4065,4280 r180 top value=24.576MHz
P1 "wj500v-5.08-03p-14-00a" CONN-TH_3P-P5.00_WJ500V-5.08-3P 7625,6010 r90 top
P2 "电源" CONN-TH_2P-P5.08 930,8855 r180 top
Q1 "2n7002,215" SOT-23_L2.9-W1.3-P1.90-LS2.4-BR 6710,5895 r180 top
Q2 "dmp6023le-13" SOT-223-4_L6.5-W3.5-P2.30-LS7.0-BR 930,8010 r270 top
R1 "4.7K" 0603R 4480,8515 r270 top
R2 "0Ω" 0603R 7355,6259.92 r270 top
R3 "330Ω" 0603R 6730,6024.92 r270 top
R4 "10K" 0603R 7355,6129.92 r270 top
R5 "1K" 0603R 4565,8515 r270 top
R6 "NC" 0603R 2520,3814.92 r270 top
R7 "100Ω" 0603R 6480.08,5930 r0 top
R8 "2.2KΩ" 0603R 2576.42,3683.82 r90 top
R9 "5.1K" 0603R 3607.47,8449.92 r270 top
R10 "DNP_10K" 0603R 5370,8515 r270 top
R11 "5.1K" 0603R 3708.03,8449.92 r270 top
R12 "100KΩ" 0603R 6580,5899.92 r90 top
R13 "2.2KΩ" 0603R 2650.88,3683.82 r90 top
R14 "5.1K" 0603R 3812,8449.92 r270 top
R15 "1K" 0603R 5285.77,8515 r270 top
R16 "5.1K" 0603R 3907.9,8449.92 r270 top
R17 "5.1K" 0603R 4009.08,8449.92 r270 top
R18 "10K" 0603R 4210,4280 r270 top
R19 "10kΩ" 0603R 2635,4545.08 r270 top
R20 "10kΩ" 0603R 2700,4545 r270 top
R21 "2kΩ/DNP" 0603R 2765,4545 r270 top
R22 "2kΩ/DNP" 0603R 2830,4545.08 r270 top
R23 "NC" 0603R 2710,3809.92 r270 top
R24 "33Ω" 0603R 2895,4544.92 r90 top
R25 "2.2KΩ" 0603R 2765,3683.82 r90 top
R26 "33Ω" 0603R 2960,4544.92 r90 top
R27 "33Ω" 0603R 4020,4129.92 r270 top
R28 "33Ω" 0603R 3025,4544.92 r90 top
R29 "2.2KΩ" 0603R 2841.67,3683.82 r90 top
R30 "10K" 0603R 5705,5105 r90 top
R31 "33Ω" 0603R 3090,4544.92 r90 top
R32 "1K" 0603R 5149.92,7055 r180 top
R33 "10K" 0603R 5720,5475 r90 top
R34 "4.7K" 0603R 7320,6780.08 r270 top
R35 "NC" 0603R 2900,3809.92 r270 top
R36 "10kΩ" 0603R 2635,4419.92 r270 top
R37 "10kΩ" 0603R 2700,4420 r90 top
R38 "4.7K" 0603R 3530,7079.92 r270 top
R39 "2.2KΩ" 0603R 2960,3683.82 r90 top
R40 "4.7K" 0603R 3450,6969.92 r90 top
R41 "10K" 0603R 5695,5205 r180 top
R42 "120" 0603R 7220,6939.92 r270 top
R43 "2.2KΩ" 0603R 3031.15,3683.82 r90 top
R44 "10K" 0603R 7345,5290 r0 top
R45 "0Ω" 0603R 7350.08,5160 r180 top
R46 "NC" 0603R 3090,3809.92 r270 top
R47 "DNP(47kΩ)" 0603R 3345,4420 r0 top
R48 "2.2KΩ" 0603R 3149.86,3683.82 r90 top
R49 "120Ω" 0603R 7470,5194.92 r270 top
R50 "1kΩ" 0603R 3480,4260 r90 top
R51 "10K" 0603R 6625,6865 r270 top
R52 "2.2KΩ" 0603R 3221.51,3683.82 r90 top
R53 "3kΩ" 0603R 3265.08,4645 r180 top
R54 "0Ω" 0603R 7350,5095 r180 top
R55 "4.7K" 0603R 7320,6940 r90 top
R56 "NC" 0603R 4385,3784.92 r270 top
R57 "2.2KΩ" 0603R 4445,3660 r90 top
R58 "10kΩ" 0603R 4480,4560 r270 top
R59 "10kΩ" 0603R 4545,4565 r270 top
R60 "2.2KΩ" 0603R 4515,3660 r90 top
R61 "2kΩ/DNP" 0603R 4610,4565 r270 top
R62 "2kΩ/DNP" 0603R 4675,4565.08 r270 top
R63 "33Ω" 0603R 4740,4565 r90 top
R64 "33Ω" 0603R 4805,4565 r90 top
R65 "NC" 0603R 4595,3784.92 r270 top
R66 "33Ω" 0603R 4870,4565 r90 top
R67 "2.2KΩ" 0603R 4655,3654.92 r90 top
R68 "33Ω" 0603R 4935,4565 r90 top
R69 "2.2KΩ" 0603R 4725,3654.92 r90 top
R70 "10kΩ" 0603R 4480,4419.92 r270 top
R71 "10kΩ" 0603R 4545,4420 r90 top
R72 "10KΩ" 0603R 6695,7725 r270 top
R73 "NC" 0603R 4790,3784.92 r270 top
R74 "2.2KΩ" 0603R 4850,3655 r90 top
R75 "100Ω" 0603R 3685,5620 r90 top
R76 "330Ω" 0603R 7715,8475.08 r90 top
R77 "2.2KΩ" 0603R 4920,3655 r90 top
R78 "100Ω" 0603R 3620,5619.92 r90 top
R79 "100Ω" 0603R 5100.08,5815 r0 top
R80 "33Ω" 0603R 3555,5620 r90 top
R81 "1KΩ" 0603R 6414.92,7725 r180 top
R82 "DNP(47kΩ)" 0603R 5210,4435 r0 top
R83 "100Ω" 0603R 5099.92,5880 r0 top
R84 "22Ω" 0603R 3490,5620 r90 top
R85 "1MΩ" 0603R 7510,8549.92 r90 top
R86 "NC" 0603R 4980,3784.92 r270 top
R87 "1kΩ" 0603R 5340,4275.08 r90 top
R88 "6.49KΩ" 0603R 6490,8259.92 r90 top
R89 "3kΩ" 0603R 5095,4665 r180 top
R90 "33Ω" 0603R 6290,7790 r180 top
R91 "2.2KΩ" 0603R 5040,3655 r90 top
R92 "1KΩ" 0603R 6425,8259.92 r90 top
R93 "33Ω" 0603R 6415,7855 r180 top
R94 "33Ω" 0603R 6290.08,7920 r180 top
R95 "2.2KΩ" 0603R 5110,3655 r90 top
R96 "0Ω/DNP" 0603R 7295,8550 r90 top
R97 "33Ω" 0603R 6360,8259.92 r270 top
R98 "33Ω" 0603R 6295,8260.08 r90 top
R99 "22Ω" 0603R 5185,6380 r0 top
R100 "22Ω" 0603R 5185,6250 r0 top
R101 "22Ω" 0603R 5185,6315 r0 top
R102 "1KΩ" 0603R 6414.92,7790 r180 top
R103 "1KΩ" 0603R 6415,7920 r180 top
R104 "100Ω" 0603R 4180,7625.08 r90 top
R105 "100Ω" 0603R 3985,7625 r90 top
R106 "100Ω" 0603R 4050,7625 r90 top
R107 "22Ω" 0603R 5185,6185 r0 top
R108 "10KΩ" 0603R 4315,5069.84 r90 top
R109 "33Ω" 0603R 4005,7079.92 r270 top
R110 "100Ω" 0603R 4115,7625 r90 top
R111 "33Ω" 0603R 3940,7080 r270 top
R112 "100Ω" 0603R 4245,7625 r270 top
R113 "100Ω" 0603R 4315,5194.92 r270 top
R114 "33Ω" 0603R 3875,7080 r270 top
R115 "1KΩ" 0603R 5185,6120 r0 top
R116 "10KΩ" 0603R 5450,6630 r270 top
R117 "100Ω" 0603R 5450,6755 r90 top
R118 "10KΩ" 0603R 5385,6630.08 r270 top
R119 "100Ω" 0603R 5385,6755 r90 top
R120 "NC" 0603R 2350,3179.92 r90 top
R121 "10KΩ" 0603R 5320,6630 r270 top
R122 "100Ω" 0603R 5320,6755.08 r90 top
R123 "NC" 0603R 2685,3184.92 r90 top
R124 "100Ω" 0603R 5255,6755 r90 top
R125 "10KΩ" 0603R 5255,6630 r90 top
R126 "0" 0603R 2595,6295.08 r270 top
R127 "442KΩ" 0603R 1540,6775 r90 top
R128 "16.9KΩ" 0603R 2345,6810 r90 top
R129 "10K/DNP" 0603R 6520.08,6725 r180 top
R130 "250Ω" 0603R 4495,890 r90 top
R131 "53.6KΩ" 0603R 1765,6479.92 r90 top
R132 "243KΩ" 0603R 1610,6610 r90 top
R133 "NC" 0603R 3024.84,3190 r90 top
R134 "NC" 0603R 3355,3190 r90 top
R135 "NC" 0603R 4300,3189.92 r90 top
R136 "250Ω" 0603R 875,890 r90 top
R137 "250Ω" 0603R 5400,890 r90 top
R138 "250Ω" 0603R 6305,890 r90 top
R139 "NC" 0603R 4635,3190 r90 top
R140 "NC" 0603R 4970,3189.92 r90 top
R141 "NC" 0603R 5305,3195 r90 top
R142 "250Ω" 0603R 7244.61,890 r90 top
R143 "250Ω" 0603R 2685,890 r90 top
R144 "250Ω" 0603R 3590,890 r90 top
R145 "0Ω/DNP" 0603R 4165,1079.92 r270 top
R146 "90.9KΩ" 0603R 1540,6649.92 r90 top
R147 "250Ω" 0603R 1780,890 r90 top
R148 "0Ω" 0603R 4659.96,1010 r0 top
R149 "0Ω" 0603R 4077.86,1080.08 r270 top
R150 "10.2KΩ" 0603R 1765,6350 r90 top
R151 "0Ω" 0603R 475,1080.08 r270 top
R152 "0Ω" 0603R 1020,1010 r0 top
R153 "0Ω" 0603R 5569.94,1010 r0 top
R154 "0Ω" 0603R 4978.57,1080.08 r270 top
R155 "0Ω" 0603R 6480.08,1005 r0 top
R156 "0Ω" 0603R 5879.29,1080.08 r270 top
R157 "0Ω" 0603R 7389.92,1010 r0 top
R158 "0Ω" 0603R 2839.98,1010 r0 top
R159 "0Ω" 0603R 2276.43,1080.08 r270 top
R160 "0Ω" 0603R 3749.97,1010 r0 top
R161 "0Ω" 0603R 6840.6,1080.08 r270 top
R162 "0Ω" 0603R 3177.14,1080.08 r270 top
R163 "0Ω" 0603R 1929.99,1010 r0 top
R164 "0Ω" 0603R 1375.71,1080.08 r270 top
R165 "510R" 0603R 4960.07,1297.93 r90 top
R166 "50K" 0603R 4960.07,1422.85 r90 top
R167 "510R" 0603R 4014.76,1307.85 r90 top
R168 "50K" 0603R 4014.76,1432.77 r90 top
R169 "510R" 0603R 5903.53,1292.77 r90 top
R170 "50K" 0603R 5903.53,1417.7 r90 top
R171 "510R" 0603R 6840.6,1287.7 r90 top
R172 "50K" 0603R 6840.6,1412.62 r90 top
R173 "510R" 0603R 1256.23,1293.63 r90 top
R174 "50K" 0603R 1256.23,1418.55 r90 top
R175 "510R" 0603R 2154.95,1298.53 r90 top
R176 "50K" 0603R 2154.95,1423.45 r90 top
R177 "510R" 0603R 3072.9,1298.09 r90 top
R178 "50K" 0603R 3072.9,1423.17 r90 top
R179 "510R" 0603R 300,1305.08 r90 top
R180 "50K" 0603R 300,1430 r90 top
R181 "510R" 0603R 4960.07,1587.85 r90 top
R182 "15K" 0603R 4960.07,1712.85 r90 top
R183 "510R" 0603R 4014.76,1602.85 r90 top
R184 "15K" 0603R 4014.76,1727.85 r90 top
R185 "510R" 0603R 5903.53,1587.77 r90 top
R186 "15K" 0603R 5903.53,1712.62 r90 top
R187 "510R" 0603R 6840.6,1582.54 r90 top
R188 "15K" 0603R 6840.6,1712.62 r90 top
R189 "510R" 0603R 1261.23,1613.63 r90 top
R190 "15K" 0603R 1261.23,1738.63 r90 top
R191 "510R" 0603R 2154.95,1603.61 r90 top
R192 "15K" 0603R 2154.95,1728.53 r90 top
R193 "510R" 0603R 3072.9,1598.09 r90 top
R194 "15K" 0603R 3072.9,1723.17 r90 top
R195 "4.7Ω" 0603R 690,5810 r90 top
R196 "510R" 0603R 295,1630.08 r90 top
R197 "15K" 0603R 295,1760 r90 top
R198 "510R" 0603R 5575.07,1292.77 r90 top
R199 "5K" 0603R 5575.07,1417.85 r90 top
R200 "4.7Ω" 0603R 690,5510.08 r90 top
R201 "510R" 0603R 4634.76,1297.93 r90 top
R202 "5K" 0603R 4634.76,1422.85 r90 top
R203 "510R" 0603R 6518.53,1292.77 r90 top
R204 "5K" 0603R 6518.53,1417.7 r90 top
R205 "510R" 0603R 7455.6,1277.62 r90 top
R206 "5K" 0603R 7455.6,1412.54 r90 top
R207 "510R" 0603R 1891.23,1298.71 r90 top
R208 "5K" 0603R 1891.23,1423.63 r90 top
R209 "510R" 0603R 2779.95,1298.53 r90 top
R210 "5K" 0603R 2779.95,1423.61 r90 top
R211 "510R" 0603R 3692.9,1298.09 r90 top
R212 "5K" 0603R 3692.9,1423.25 r90 top
R213 "510R" 0603R 940,1315 r90 top
R214 "5K" 0603R 940,1440 r90 top
R215 "不焊" 0603R 5575.07,1587.93 r90 top
R216 "510R" 0603R 5575.07,1712.85 r90 top
R217 "不焊" 0603R 4634.76,1597.77 r90 top
R218 "510R" 0603R 4634.76,1722.77 r90 top
R219 "不焊" 0603R 6518.53,1582.7 r90 top
R220 "510R" 0603R 6518.53,1707.62 r90 top
R221 "不焊" 0603R 7455.6,1582.62 r90 top
R222 "510R" 0603R 7455.6,1712.62 r90 top
R223 "不焊" 0603R 1891.23,1618.63 r90 top
R224 "510R" 0603R 1891.23,1743.71 r90 top
R225 "不焊" 0603R 2779.95,1603.61 r90 top
R226 "510R" 0603R 2779.95,1728.61 r90 top
R227 "不焊" 0603R 3692.9,1603.17 r90 top
R228 "510R" 0603R 3692.9,1733.17 r90 top
R229 "0Ω/DNP" 0603R 5065,1080 r270 top
R230 "不焊" 0603R 940,1630 r90 top
R231 "510R" 0603R 940,1755 r90 top
R232 "0Ω/DNP" 0603R 5965,1079.92 r270 top
R233 "30M" 0603R 5201.5,1873.23 r180 top
R234 "30M" 0603R 4246.95,1868.23 r180 top
R235 "0Ω/DNP" 0603R 565,1084.92 r270 top
R236 "0Ω/DNP" 0603R 6930,1079.92 r270 top
R237 "0Ω/DNP" 0603R 2360,1080 r270 top
R238 "0Ω/DNP" 0603R 3265,1079.92 r270 top
R239 "0Ω/DNP" 0603R 1460,1080 r270 top
R240 "30M" 0603R 6134.3,1857.93 r180 top
R241 "30M" 0603R 7070.01,1858.01 r180 top
R242 "0Ω/DNP" 0603R 5735,1305 r180 top
R243 "30M" 0603R 1510,1860 r180 top
R244 "30M" 0603R 2408.57,1865.54 r180 top
R245 "30M" 0603R 3303.49,1868.23 r180 top
R246 "0Ω/DNP" 0603R 4795,1300 r180 top
R247 "30M" 0603R 540,1870.08 r180 top
R248 "0Ω/DNP" 0603R 6665,1325 r180 top
R249 "510R" 0603R 5296.42,1843.23 r90 top
R250 "0Ω/DNP" 0603R 7605,1255 r180 top
R251 "0Ω/DNP" 0603R 2015,1335 r180 top
R252 "510R" 0603R 4341.87,1833.23 r90 top
R253 "0Ω/DNP" 0603R 2920,1310 r180 top
R254 "0Ω/DNP" 0603R 3840,1315 r180 top
R255 "0Ω/DNP" 0603R 1075.08,1340 r180 top
R256 "510R" 0603R 6229.3,1822.93 r90 top
R257 "0Ω/DNP" 0603R 4845,879.92 r90 top
R258 "30M" 0603R 5396.42,1843.23 r270 top
R259 "510R" 0603R 7165.01,1828.01 r90 top
R260 "510R" 0603R 1601.93,1828.99 r90 top
R261 "510R" 0603R 2503.44,1834.07 r90 top
R262 "510R" 0603R 3396.39,1836.41 r90 top
R263 "30M" 0603R 4441.87,1833.23 r270 top
R264 "510R" 0603R 635,1840.08 r90 top
R265 "30M" 0603R 6330,1820 r270 top
R266 "30M" 0603R 7270.01,1828.01 r270 top
R267 "30M" 0603R 1705,1825 r270 top
R268 "30M" 0603R 2603.49,1830.54 r270 top
R269 "30M" 0603R 3500,1835 r270 top
R270 "30M" 0603R 735,1840.08 r270 top
R273 "10KΩ" 0603R 885,7029.92 r270 top
R274 "100K" R0805_NEW 715,7760 r0 top value=100kΩ
R275 "0Ω/DNP" 0603R 3960,899.92 r90 top
R276 "0Ω/DNP" 0603R 5745,870 r90 top
R277 "0Ω/DNP" 0603R 6715,890 r90 top
R278 "0Ω/DNP" 0603R 1255,860.08 r90 top
R279 "0Ω/DNP" 0603R 2155,870 r90 top
R280 "0Ω/DNP" 0603R 3050,909.92 r90 top
R281 "0Ω/DNP" 0603R 270,935 r90 top
R282 "0Ω" 0603R 2250,3389.92 r90 top
R283 "0Ω" 0603R 2585,3394.92 r90 top
R284 "0Ω" 0603R 2919.84,3400 r90 top
R285 "0Ω" 0603R 3255,3404.92 r90 top
R286 "0Ω" 0603R 4200,3399.92 r90 top
R287 "0Ω" 0603R 4535,3399.92 r90 top
R288 "0Ω" 0603R 4870,3404.92 r90 top
R289 "0Ω" 0603R 5205,3405 r90 top
R290 "0Ω/DNP" 0603R 5735,1370 r0 top
R291 "0Ω/DNP" 0603R 4795,1365 r0 top
R292 "0Ω/DNP" 0603R 6665.08,1395 r0 top
R293 "0Ω/DNP" 0603R 7605,1320 r180 top
R294 "0Ω/DNP" 0603R 2015.08,1405 r0 top
R295 "0Ω/DNP" 0603R 2920,1375 r0 top
R296 "0Ω/DNP" 0603R 3840.08,1380 r0 top
R297 "0Ω/DNP" 0603R 1075,1405 r0 top
R298 "0Ω/DNP" 0603R 6310.08,7635 r180 top
R299 "100Ω" 0603R 6180,7635 r180 top
R300 "0Ω/DNP" 0603R 385,225 r90 top
R301 "0Ω/DNP" 0603R 7520,225 r90 top
R302 "0Ω/DNP" 0603R 7515,8825 r270 top
R303 "0Ω/DNP" 0603R 370,8825 r270 top
Rg1 "5.49K" 0603R 4277.18,745 r180 top
Rg2 "5.49K" 0603R 680.08,745 r180 top
Rg3 "5.49K" 0603R 5176.45,745 r180 top
Rg4 "5.49K" 0603R 6075.73,745 r180 top
Rg5 "5.49K" 0603R 7050.61,745 r180 top
Rg6 "5.49K" 0603R 2478.63,745 r180 top
Rg7 "5.49K" 0603R 3377.9,745 r180 top
Rg8 "5.49K" 0603R 1579.35,745 r180 top
RJ1 "si-46001-f" RJ45-TH_BELFUSE_SI-46001-F 7465,8050 r90 top
SW1 "SW_PB_ESW" "TSW SMD-6*6*4.3" 4580,8790 r180 top
SW2 "SW_PB_ESW" "TSW SMD-6*6*4.3" 5220.29,8790 r180 top
SW3 "2MS1T2B2VS2QES" SW-TH_2MS1T2B2VS2QES 925,8315 r90 top
T1 "TEST POINT" TEST 2370,4350 r0 top
U1 "CH340G" SOP16M 7210,4282.36 r180 top
U2 "pc817x2csp9f" SMD-4_L4.6-W6.5-P2.54-LS10.2-TL 7020,5955 r0 top
U3 "adau1979wbcpz-rl" QFN-40_L6.0-W6.0-P0.50-TL-EP4.1 3070,4260 r180 top
U4 "MAX3485" SOIC-8 6735,6930 r0 top
U5 "m24c64-rmn6tp" SOIC-8_L5.0-W4.0-P1.27-LS6.0-BL 3250,7075 r270 top
U6 "TJA1057GT3_8P" SOIC-8 6880,5205 r0 top
U7 "gpha201-0202a001a1ba" HDR-TH_4P-P2.54-V-M-R2-C2-S2.54 6445,6880 r270 top
U8 "hx pz2.54-1x2p zz" HDR-TH_2P-P2.54-V-M-3 7470,5025 r90 top
U9 "mcp2515t-i/so" SOIC-18_L11.6-W7.5-P1.27-LS10.3-BL 6006.02,5305 r90 top
U10 "adau1979wbcpz-rl" QFN-40_L6.0-W6.0-P0.50-TL-EP4.1 4936.95,4270 r180 top
U11 "gpha201-0202a001a1ba" HDR-TH_4P-P2.54-V-M-R2-C2-S2.54 6390,5130 r270 top
U12 "ksz8081rnaca-tr" QFN-24_L4.0-W4.0-P0.50-BL-EP2.6 6705,7985 r90 top
U13 "gpha101-0402a001a1ba" HDR-TH_4P-P2.54-V-M 6110,8950 r180 top
U14 "lp5907mfx-3.3/nopb" SOT-23-5_L3.0-W1.7-P0.95-LS2.8-BR 2385,4980 r90 top
U15 "AMS1117-3.3_C6186" SOT-223-3_L6.5-W3.4-P2.30-LS7.0-BR 2650,5748.07 r90 top
U16 "LT1167" SO-8 4390,820 r180 top
U17 "LT1167" SO-8 790,820 r180 top
U18 "LT1167" SO-8 5290,820 r180 top
U19 "LT1167" SO-8 6190,820 r180 top
U20 "LT1167" SO-8 7161.91,820 r180 top
U21 "LT1167" SO-8 3490,820 r180 top
U22 "LT1167" SO-8 2590,820 r180 top
U23 "LT1167" SO-8 1690,820 r180 top
U24 "tps54560bddar" POWERPAD-SO-8_L4.9-W3.9-P1.27-LS6.0-BL-EP 1730,6775 r270 top
U25 "URA2412S-6WR3" PWRM-TH_URAXXXXS-6WR3 310,5905 r270 top value=500kHz
U26 "ura2415ymd-15wr3" PWRM-TH_URA2415YMD-15WR3 555,4195 r270 top
U27 "LT1793" SOP-8 5176.48,1966.09 r90 top
U28 "LT1793" SOP-8 4211.62,1966.09 r90 top
U29 "LT1793" SOP-8 6112.82,1945.62 r90 top
U30 "LT1793" SOP-8 7050.61,1945.62 r90 top
U31 "LT1793" SOP-8 1481.93,1954.07 r90 top
U32 "LT1793" SOP-8 2393.44,1954.07 r90 top
U33 "LT1793" SOP-8 3286.39,1956.41 r90 top
U34 "LT1793" SOP-8 535,1955.08 r90 top
U35 "dg201BDY" dg201BDY 2464.95,1538.53 r90 top
U36 "dg201BDY" dg201BDY 1571.93,1544.07 r90 top
U37 "dg201BDY" dg201BDY 3377.9,1533.17 r90 top
U38 "dg201BDY" dg201BDY 622.7,1555 r90 top
U39 "dg201BDY" dg201BDY 7140.68,1522.62 r90 top
U40 "dg201BDY" dg201BDY 4321.88,1537.85 r90 top
U41 "dg201BDY" dg201BDY 5266.55,1527.85 r90 top
U42 "dg201BDY" dg201BDY 6209.31,1522.7 r90 top
U43 "ref2030aiddcr" SOT-23-5_L2.9-W1.6-P0.95-LS2.8-BL 3665,3730 r90 top
U44 "opa192idbvr" SOT-23-5_L3.0-W1.7-P0.95-LS2.8-BL 4050,3730 r270 top
USB1 "MicroXNJ" MICRO-USB-SMD_MICROXNJ 7647.27,4290.47 r90 top
X1 "12M" "HC-49S_L11.4-W4.8 - duplicate" 6815,4270 r270 top
X2 "x503216msb2gi" OSC-SMD_L5.0-W3.2 6360,5455.71 r90 top value=16MHz
Y1 "25MHz" SMD3225-4P 6765,8245 r180 top
Z1 "PESD3V3L1BA" SOD-323 4750,8505 r90 top
Z2 "PESD3V3L1BA" SOD-323 5205,8540 r270 top

## Footprints (in the part's own frame and the unit in brackets; to place one, negate y for a bottom-side part, rotate by r counter-clockwise, add the part's x,y. Pads: shape width x height; smd on the part's side, far side on the other; paste and mask are expansions set on the pad)
5x11mm [mm]
  round 1.3 hole 0.8: 1(-1.016,0) 2(0.984,0)
  silkscreen extent -2.52,-2.5 2.48,2.5
0603C [mm]
  rect 0.76x0.8 smd: 1(-0.76,0) 2(0.76,0)
  silkscreen extent -1.46,-0.7 1.46,0.7
0603R [mm]
  rect 0.76x0.8 smd: 1(-0.76,0) 2(0.76,0)
  silkscreen extent -1.46,-0.7 1.46,0.7
1210L [mm]
  rect 1.5x2.5 smd: 1(-1.4,0) 2(1.4,0)
  silkscreen extent -2.2,-1.55 2.2,1.55
C0805 [mm]
  rect 1.41x1.35 smd paste-100 mask+0.051: 1(-1,0) 2(1,0)
  silkscreen extent -1.96,-0.9 1.96,0.9
C1206#1 [mil]
  rect 58.5x68 smd paste-3937 mask+2: 1(-62.7,0) 2(62.7,0)
  silkscreen extent -101,-43 101,43
C1206#2 [mil]
  rect 58.47x68.03 smd paste-3937.01 mask+2: 1(-62.7,0) 2(62.7,0)
  silkscreen extent -101,-43 101,43
C1210 [mil]
  rect 64.4x106.3 smd paste-3937 mask+2: 1(-59.7,0) 2(59.8,0)
  silkscreen extent -101,-62 101,62
"C 0603_L" [mil]
  rect 30x30 smd: 1(-25.6,0) 2(25.6,0)
  silkscreen extent -51,-26 51,26
"C 0805_L" [mil] "无极性贴片电容                                        淘宝ID:黄晶宝石"
  rect 35x50 smd: 1(-37.4,0) 2(37.4,0)
  silkscreen extent -67,-36 67,36, body extent -39,-24 39,24, height 20
CAP-TH_BD6.3-P2.50-D0.6-FD [mm]
  round 1.75 hole 1.1 paste-2539.97 mask+0.05: 1(-1.25,0) 2(1.25,0)
  silkscreen extent -3.15,-3.15 3.21,3.15
CAP-TH_BD8.0-P3.50-D0.6-FD [mm]
  round 1.6 hole 1: 1(-1.75,0) 2(1.75,0)
  silkscreen extent -3.96,-4 4.04,4
CAP-TH_BD8.0-P3.50-D0.6-FD_1 [mm]
  round 1.6 hole 1 paste-2539.97 mask+0.051: 1(-1.75,0) 2(1.75,0)
  silkscreen extent -3.96,-4 4.04,4
CAP-TH_BD10.0-P5.00-D1.0-FD [mm]
  round 1.6 hole 1: 1(-2.54,0) 2(2.54,0)
  silkscreen extent -5,-5 5.08,5
CON_5PIN_DIP_2D54 [mil]
  round 54 hole 40: 1(202,144) 2(102,144) 3(2,144) 4(-98,144) 5(-198,144) 6(-198,-156) 7(-98,-156) 8(2,-156) 9(102,-156) 10(202,-156)
  silkscreen extent -278,-201 280,235
CONN-TH_2P-P5.08 [mm]
  round 2.2 hole 1.3 paste-2539.97 mask+0.051: 1(-2.54,0) 2(2.54,0)
  silkscreen extent -5.72,-4.1 5.08,4.1
CONN-TH_3P-P5.00_WJ500V-5.08-3P [mm]
  round 2 hole 1.3: 1(-5.08,0) 2(0,0) 3(5.08,0)
  silkscreen extent -7.64,-5.53 8.15,4.5
dg201BDY [mil]
  oval 23.7x77.6 smd paste+2 mask+4: 1(-175,-107.7) 2(-125,-107.7) 3(-75,-107.7) 4(-25,-107.7) 5(25,-107.7) 6(75,-107.7) 7(125,-107.7) 8(175,-107.7) 9(175,107.7) 10(125,107.7) 11(75,107.7) 12(25,107.7) 13(-25,107.7) 14(-75,107.7) 15(-125,107.7) 16(-175,107.7)
  silkscreen extent -211,-111 198,60
FUSE-SMD_L6.1-W2.7 [mm]
  rect 2.91x2.905 smd paste-100 mask+0.051: 1(-2.33,0) 2(2.33,0)
  silkscreen extent -4.06,-1.78 4.06,1.78
"HC-49S_L11.4-W4.8 - duplicate" [mm]
  rect 5.5x1.3 smd: 1(4.553,0) 2(-4.553,0)
  silkscreen extent -5.72,-2.41 5.72,2.41
HDR2.54-Y-LI-2P [mm] "圆孔排母，2脚"
  rect 1.7x1.7 hole 0.9: 1(-1.27,0)
  round 1.7 hole 0.9: 2(1.27,0)
  silkscreen extent -2.67,-1.27 2.67,1.27, body extent -2.54,-1.27 2.54,1.27, height 4.31
HDR-TH_2P-P2.54-V-M-3 [mm]
  rect 1.8x1.8 hole 1.1: 1(-1.27,0)
  round 1.8 hole 1.1: 2(1.27,0)
  silkscreen extent -2.54,-1.27 2.54,1.27
HDR-TH_4P-P2.54-V-M [mm]
  rect 1.7x1.7 hole 1.1: 1(-3.81,0)
  round 1.7 hole 1.1: 2(-1.27,0) 3(1.27,0) 4(3.81,0)
  silkscreen extent -5.08,-1.27 5.08,1.27
HDR-TH_4P-P2.54-V-M-R2-C2-S2.54 [mm]
  rect 1.7x1.7 hole 1.1: 1(-1.27,-1.27)
  round 1.7 hole 1.1: 2(-1.27,1.27) 3(1.27,-1.27) 4(1.27,1.27)
  silkscreen extent -2.77,-2.54 2.77,2.54
HDR-TH_10P-P2.54-V-M-R2-C5-S2.54 [mm]
  rect 1.7x1.7 hole 1.1: 1(-5.08,-1.27)
  round 1.7 hole 1.1: 2(-5.08,1.27) 3(-2.54,-1.27) 4(-2.54,1.27) 5(0,-1.27) 6(0,1.27) 7(2.54,-1.27) 8(2.54,1.27) 9(5.08,-1.27) 10(5.08,1.27)
  silkscreen extent -6.35,-2.54 6.35,2.54
IDC2.54-LI-2x12P [mil]
  rect 63x63 hole 35.4: 1(0,0)
  round 63 hole 35.4: 2(0,100) 3(100,0) 4(100,100) 5(200,0) 6(200,100) 7(300,0) 8(300,100) 9(400,0) 10(400,100) 11(500,0) 12(500,100) 13(600,0) 14(600,100) 15(700,0) 16(700,100) 17(800,0) 18(800,100) 19(900,0) 20(900,100) 21(1000,0) 22(1000,100) 23(1100,0) 24(1100,100)
  silkscreen extent -201,-127 1301,227
IDC-TH_14P-P2.54-V-R2-C7-S2.54 [mm]
  rect 1.8x1.8 hole 1.1: 1(-7.62,-1.27)
  round 1.8 hole 1.1: 2(-7.62,1.27) 3(-5.08,-1.27) 4(-5.08,1.27) 5(-2.54,-1.27) 6(-2.54,1.27) 7(0,-1.27) 8(0,1.27) 9(2.54,-1.27) 10(2.54,1.27) 11(5.08,-1.27) 12(5.08,1.27) 13(7.62,-1.27) 14(7.62,1.27)
  silkscreen extent -12.98,-4.5 12.95,4.52
IND-SMD_L6.0-W6.0 [mm]
  rect 2.2x5.72 smd: 1(-2.5,0) 2(2.5,0)
  silkscreen extent -3.18,-3.18 3.18,3.18
IND-SMD_L10.2-W10.2_7447798720 [mm]
  rect 2.5x4.4 smd: 1(-4.3,0) 2(4.3,0)
  silkscreen extent -5.1,-5.1 5.1,5.1
KF128-5.08-2P [mm] "螺钉式接线端子，脚距5.08mm"
  oval 2.5x3.5 hole 1.2: 1(-2.54,0) 2(2.54,0)
  silkscreen extent -5.59,-5.31 5.08,5.21, body extent -5.58,-5.3 5.08,5.2, height 14.15
L0603 [mil]
  rect 31.5x34 smd paste-3937 mask+2: 1(-27.6,0) 2(27.5,0)
  silkscreen extent -56,-26 56,26
L1206 [mm]
  rect 1.485x1.728 smd paste-100 mask+0.051: 1(-1.593,0) 2(1.593,0)
  silkscreen extent -2.56,-1.09 2.56,1.09
"LED 0805R" [mil] "红色0805LED                                       淘宝ID:黄晶宝石"
  rect 60x50 smd: 1(-50,0)
  oct 60x50 smd: 2(50,0)
  silkscreen extent -90,-35 105,35, body extent -39,-25 39,25, height 32
MICRO-USB-SMD_MICROXNJ [mm]
  rect 0.4x1.6 smd paste-100 mask+0.051: 1(-1.3,1.596) 2(-0.65,1.596) 3(0,1.596) 4(0.65,1.596) 5(1.3,1.596)
  round 1.3 hole 0.7: 6(2.425,1.074) 9(-2.425,1.074)
  oval 1.3x1.8 hole 0.7 slot 1.1 at 90 deg: 7(3.625,-1.596) 8(-3.625,-1.596)
  silkscreen extent -3.87,-4.24 3.93,1.71
NLWBS05-50C-2.2H [mil]
  rect 70.9x11.8 smd: 1(10798.2,21632.2) 2(10947.8,21632.2) 3(10798.2,21612.5) 4(10947.8,21612.5) 5(10798.2,21592.9) 6(10947.8,21592.9) 7(10798.2,21573.2) 8(10947.8,21573.2) 9(10798.2,21553.5) 10(10947.8,21553.5) 11(10798.2,21533.8) 12(10947.8,21533.8) 13(10798.2,21514.1) 14(10947.8,21514.1) 15(10798.2,21494.4) 16(10947.8,21494.4) 17(10798.2,21474.7) 18(10947.8,21474.7) 19(10798.2,21455.1) 20(10947.8,21455.1) 21(10798.2,21435.4) 22(10947.8,21435.4) 23(10798.2,21415.7) 24(10947.8,21415.7) 25(10798.2,21396) 26(10947.8,21396) 27(10798.2,21376.3) 28(10947.8,21376.3) 29(10798.2,21356.6) 30(10947.8,21356.6) 31(10798.2,21336.9) 32(10947.8,21336.9) 33(10798.2,21317.3) 34(10947.8,21317.3) 35(10798.2,21297.6) 36(10947.8,21297.6) 37(10798.2,21277.9) 38(10947.8,21277.9) 39(10798.2,21258.2) 40(10947.8,21258.2) 41(10798.2,21238.5) 42(10947.8,21238.5) 43(10798.2,21218.8) 44(10947.8,21218.8) 45(10798.2,21199.1) 46(10947.8,21199.1) 47(10798.2,21179.5) 48(10947.8,21179.5) 49(10798.2,21159.8) 50(10947.8,21159.8)
  round 21.7 hole 21.7: " "(10823.8,21122.4) " "(10823.8,21669.6)
  silkscreen extent 10786,21097 10960,21695
OSC-SMD_4P-L3.2-W2.5-BL [mil]
  rect 55.1x47.2 smd: 1(-43.3,-34.5) 2(43.3,-34.5) 3(43.3,34.4) 4(-43.3,34.4)
  silkscreen extent -90,-75 82,68
OSC-SMD_L5.0-W3.2 [mm]
  rect 1.9x2.4 smd: 1(-2.05,0) 2(2.05,0)
  silkscreen extent -3.32,-1.85 3.33,1.85
POWERPAD-SO-8_L4.9-W3.9-P1.27-LS6.0-BL-EP [mm]
  oval 0.6x1.6 smd: 1(-1.905,-3) 2(-0.635,-3) 3(0.635,-3) 4(1.905,-3) 5(1.905,3) 6(0.635,3) 7(-0.635,3) 8(-1.905,3)
  rect 3.2x2.5 smd: 9(0,0)
  silkscreen extent -2.5,-2 2.5,2
PWRM-TH_URA2415YMD-15WR3 [mm]
  round 2 hole 1.5: 1(-10.16,10.16) 2(-10.16,2.54) 3(-10.16,-2.54) 4(10.16,-10.16) 5(10.16,0) 6(10.16,10.16)
  silkscreen extent -12.7,-12.7 12.7,12.7
PWRM-TH_URAXXXXS-6WR3 [mm]
  round 1.8 hole 1.2: 1(-8.89,0) 2(-6.35,0) 3(-3.81,0) 5(1.27,0) 6(3.81,0) 7(6.35,0) 8(8.89,0)
  silkscreen extent -11,-6.8 11,2.7
QFN-24_L4.0-W4.0-P0.50-BL-EP2.6 [mm]
  rect 0.28x0.665 smd paste-100 mask+0.05: 1(-1.25,-1.908) 2(-0.75,-1.908) 3(-0.25,-1.908) 4(0.25,-1.908) 5(0.75,-1.908) 6(1.25,-1.908) 13(1.25,1.908) 14(0.75,1.908) 15(0.25,1.908) 16(-0.25,1.908) 17(-0.75,1.908) 18(-1.25,1.908)
  rect 0.665x0.28 smd paste-100 mask+0.05: 7(1.908,-1.25) 8(1.908,-0.75) 9(1.908,-0.25) 10(1.908,0.25) 11(1.908,0.75) 12(1.908,1.25) 19(-1.908,1.25) 20(-1.908,0.75) 21(-1.908,0.25) 22(-1.908,-0.25) 23(-1.908,-0.75) 24(-1.908,-1.25)
  rect 2.55x2.55 smd paste-100 mask+0.05: 25(0,0)
  silkscreen extent -2.08,-2.53 2.08,2.08
QFN-40_L6.0-W6.0-P0.50-TL-EP4.1 [mil]
  rect 31.5x11 smd paste-3937 mask+2: 1(-118.1,88.5) 2(-118.1,68.9) 3(-118.1,49.2) 4(-118.1,29.5) 5(-118.1,9.8) 6(-118.1,-9.9) 7(-118.1,-29.6) 8(-118.1,-49.3) 9(-118.1,-68.9) 10(-118.1,-88.6) 21(118.1,-88.6) 22(118.1,-68.9) 23(118.1,-49.3) 24(118.1,-29.6) 25(118.1,-9.9) 26(118.1,9.8) 27(118.1,29.5) 28(118.1,49.2) 29(118.1,68.9) 30(118.1,88.5)
  rect 11x31.5 smd paste-3937 mask+2: 11(-88.6,-118.2) 12(-68.9,-118.2) 13(-49.2,-118.2) 14(-29.5,-118.2) 15(-9.8,-118.2) 16(9.9,-118.2) 17(29.5,-118.2) 18(49.2,-118.2) 19(68.9,-118.2) 20(88.6,-118.2) 31(88.6,118.1) 32(68.9,118.1) 33(49.2,118.1) 34(29.5,118.1) 35(9.9,118.1) 36(-9.8,118.1) 37(-29.5,118.1) 38(-49.2,118.1) 39(-68.9,118.1) 40(-88.6,118.1)
  rect 161.4x161.4 smd paste-3937 mask+2: 41(0,0)
  silkscreen extent -156,-126 126,126
R0805_NEW [mil]
  rect 44.59x54.21 smd paste-3937.01 mask+2: 1(-38.04,0) 2(38.04,0)
  silkscreen extent -69,-36 69,36
RJ45-TH_BELFUSE_SI-46001-F [mm]
  round 1.4 hole 0.8: 1(-4.445,3.96) 2(-3.175,6.5) 3(-1.905,3.96) 4(-0.635,6.5) 5(0.635,3.96) 6(1.905,6.5) 7(3.175,3.96) 8(4.445,6.5)
  round 1.62 hole 1.02: 9(6.325,-6.5) 10(3.785,-6.5) 11(-3.785,-6.5) 12(-6.325,-6.5)
  round 2.17 hole 1.57: 13(-7.875,1.5) 14(7.875,1.5)
  Keep-Out Layer board cut-out: 7.315,-2.39 7.315,-2.548 7.254,-2.857 7.133,-3.148 6.958,-3.41 6.735,-3.633 6.473,-3.808 6.182,-3.928 5.873,-3.99 5.557,-3.99 5.248,-3.928 4.957,-3.808 4.695,-3.633 4.472,-3.41 4.297,-3.148 4.176,-2.857 4.115,-2.548 4.115,-2.39 4.115,-2.232 4.176,-1.923 4.297,-1.632 4.472,-1.37 4.695,-1.147 4.957,-0.972 5.248,-0.851 5.557,-0.79 5.873,-0.79 6.182,-0.851 6.473,-0.972 6.735,-1.147 6.958,-1.37 7.133,-1.632 7.254,-1.923 7.315,-2.232 7.315,-2.39 7.315,-2.39
  Keep-Out Layer board cut-out: -4.115,-2.39 -4.115,-2.548 -4.176,-2.857 -4.297,-3.148 -4.472,-3.41 -4.695,-3.633 -4.957,-3.808 -5.248,-3.928 -5.557,-3.99 -5.873,-3.99 -6.182,-3.928 -6.473,-3.808 -6.735,-3.633 -6.958,-3.41 -7.133,-3.148 -7.254,-2.857 -7.315,-2.548 -7.315,-2.39 -7.315,-2.232 -7.254,-1.923 -7.133,-1.632 -6.958,-1.37 -6.735,-1.147 -6.473,-0.972 -6.182,-0.851 -5.873,-0.79 -5.557,-0.79 -5.248,-0.851 -4.957,-0.972 -4.695,-1.147 -4.472,-1.37 -4.297,-1.632 -4.176,-1.923 -4.115,-2.232 -4.115,-2.39 -4.115,-2.39
  Keep-Out Layer circle w0.003: c5.715,-2.39 r1.6
  Keep-Out Layer circle w0.003: c-5.715,-2.39 r1.6
  Keep-Out Layer region: 7.315,-2.39 7.305,-2.569 7.275,-2.746 7.225,-2.918 7.157,-3.084 7.07,-3.241 6.966,-3.388 6.846,-3.521 6.713,-3.641 6.566,-3.745 6.409,-3.832 6.243,-3.9 6.071,-3.95 5.894,-3.98 5.715,-3.99 5.536,-3.98 5.359,-3.95 5.187,-3.9 5.021,-3.832 4.864,-3.745 4.717,-3.641 4.584,-3.521 4.464,-3.388 4.36,-3.241 4.273,-3.084 4.205,-2.918 4.155,-2.746 4.125,-2.569 4.115,-2.39 4.125,-2.211 4.155,-2.034 4.205,-1.862 4.273,-1.696 4.36,-1.539 4.464,-1.392 4.584,-1.259 4.717,-1.139 4.864,-1.035 5.021,-0.948 5.187,-0.88 5.359,-0.83 5.536,-0.8 5.715,-0.79 5.894,-0.8 6.071,-0.83 6.243,-0.88 6.409,-0.948 6.566,-1.035 6.713,-1.139 6.846,-1.259 6.966,-1.392 7.07,-1.539 7.157,-1.696 7.225,-1.862 7.275,-2.034 7.305,-2.211 7.315,-2.39
  Keep-Out Layer region: 7.315,-2.39 7.315,-2.548 7.254,-2.857 7.133,-3.148 6.958,-3.41 6.735,-3.633 6.473,-3.808 6.182,-3.928 5.873,-3.99 5.557,-3.99 5.248,-3.928 4.957,-3.808 4.695,-3.633 4.472,-3.41 4.297,-3.148 4.176,-2.857 4.115,-2.548 4.115,-2.39 4.115,-2.232 4.176,-1.923 4.297,-1.632 4.472,-1.37 4.695,-1.147 4.957,-0.972 5.248,-0.851 5.557,-0.79 5.873,-0.79 6.182,-0.851 6.473,-0.972 6.735,-1.147 6.958,-1.37 7.133,-1.632 7.254,-1.923 7.315,-2.232 7.315,-2.39 7.315,-2.39
  Keep-Out Layer region: -4.115,-2.39 -4.125,-2.569 -4.155,-2.746 -4.205,-2.918 -4.273,-3.084 -4.36,-3.241 -4.464,-3.388 -4.584,-3.521 -4.717,-3.641 -4.864,-3.745 -5.021,-3.832 -5.187,-3.9 -5.359,-3.95 -5.536,-3.98 -5.715,-3.99 -5.894,-3.98 -6.071,-3.95 -6.243,-3.9 -6.409,-3.832 -6.566,-3.745 -6.713,-3.641 -6.846,-3.521 -6.966,-3.388 -7.07,-3.241 -7.157,-3.084 -7.225,-2.918 -7.275,-2.746 -7.305,-2.569 -7.315,-2.39 -7.305,-2.211 -7.275,-2.034 -7.225,-1.862 -7.157,-1.696 -7.07,-1.539 -6.966,-1.392 -6.846,-1.259 -6.713,-1.139 -6.566,-1.035 -6.409,-0.948 -6.243,-0.88 -6.071,-0.83 -5.894,-0.8 -5.715,-0.79 -5.536,-0.8 -5.359,-0.83 -5.187,-0.88 -5.021,-0.948 -4.864,-1.035 -4.717,-1.139 -4.584,-1.259 -4.464,-1.392 -4.36,-1.539 -4.273,-1.696 -4.205,-1.862 -4.155,-2.034 -4.125,-2.211 -4.115,-2.39
  Keep-Out Layer region: -4.115,-2.39 -4.115,-2.548 -4.176,-2.857 -4.297,-3.148 -4.472,-3.41 -4.695,-3.633 -4.957,-3.808 -5.248,-3.928 -5.557,-3.99 -5.873,-3.99 -6.182,-3.928 -6.473,-3.808 -6.735,-3.633 -6.958,-3.41 -7.133,-3.148 -7.254,-2.857 -7.315,-2.548 -7.315,-2.39 -7.315,-2.232 -7.254,-1.923 -7.133,-1.632 -6.958,-1.37 -6.735,-1.147 -6.473,-0.972 -6.182,-0.851 -5.873,-0.79 -5.557,-0.79 -5.248,-0.851 -4.957,-0.972 -4.695,-1.147 -4.472,-1.37 -4.297,-1.632 -4.176,-1.923 -4.115,-2.232 -4.115,-2.39 -4.115,-2.39
  silkscreen extent -8.13,-9.17 8.13,7.9
SMB_L4.6-W3.6-LS5.3-RD [mil]
  rect 80.61x86.31 smd: 1(-92.94,0) 2(92.94,0)
  silkscreen extent -123,-77 108,77
SMC_L7.1-W6.2-LS8.1-RD [mm]
  rect 3.03x3.82 smd: 1(-3.435,0) 2(3.435,0)
  silkscreen extent -3.6,-3.11 3.6,3.11
SMD3225-4P [mm]
  rect 1.4x1.2 smd: 1(-1.27,-1.184) 2(1.27,-1.184) 3(1.27,1.016) 4(-1.27,1.016)
  silkscreen extent -2.72,-2.31 2.5,1.52
SMD-4_L4.6-W6.5-P2.54-LS10.2-TL [mm]
  rect 2x1.5 smd: 1(-4.65,1.27) 2(-4.65,-1.27) 3(4.65,-1.27) 4(4.65,1.27)
  silkscreen extent -5,-2.3 3.25,2.8
SO-8 [mil] "封装库来自淘宝卖家 ID：黄晶宝石"
  rect 80x24 smd: 1(0,0)
  oval 80x24 smd: 2(0,-50) 3(0,-100) 4(0,-150) 5(220,-150) 6(220,-100) 7(220,-50) 8(220,0)
  silkscreen extent 60,-175 160,25
SOD-123_L2.7-W1.6-LS3.7-FD [mm]
  rect 0.88x0.96 smd: 1(-1.61,0) 2(1.61,0)
  silkscreen extent -1.38,-1 1.6,1
SOD-123_L2.7-W1.6-LS3.7-RD [mm]
  rect 0.91x1.22 smd: 1(-1.635,0) 2(1.635,0)
  silkscreen extent -1.6,-1 1.38,1
SOD-323 [mm] "1.8x1.3X0.9mm（长宽高，不包括引脚）"
  rect 1x0.8 smd: 1(-1.4,0)
  oct 1x0.8 smd: 2(1.4,0)
  silkscreen extent -2.11,-0.76 2.11,0.76, body extent -1.34,-0.63 1.31,0.67, height 1
SOIC-8 [mil]
  oval 88x24 smd: 1(0,0) 2(0,-50) 3(0,-100) 4(0,-150) 5(320,-150) 6(320,-100) 7(320,-50) 8(320,0)
  silkscreen extent 60,-180 260,30, body extent -5,-181 325,31, height 91
SOIC-8_L5.0-W4.0-P1.27-LS6.0-BL [mil]
  oval 22.38x76.78 smd: 1(-75,-106.5) 2(-25,-106.5) 3(25,-106.5) 4(75,-106.5) 5(75,106.5) 6(25,106.5) 7(-25,106.5) 8(-75,106.5)
  silkscreen extent -98,-59 98,59
SOIC-18_L11.6-W7.5-P1.27-LS10.3-BL [mm]
  oval 0.56x2.1 smd: 1(-5.08,-4.8) 2(-3.81,-4.8) 3(-2.54,-4.8) 4(-1.27,-4.8) 5(0,-4.8) 6(1.27,-4.8) 7(2.54,-4.8) 8(3.81,-4.8) 9(5.08,-4.8) 10(5.08,4.8) 11(3.81,4.8) 12(2.54,4.8) 13(1.27,4.8) 14(0,4.8) 15(-1.27,4.8) 16(-2.54,4.8) 17(-3.81,4.8) 18(-5.08,4.8)
  silkscreen extent -5.84,-3.43 5.84,3.43
SOP16M [mm]
  rect 0.6x2.2 smd: 1(-4.445,-2.6) 2(-3.175,-2.6) 3(-1.905,-2.6) 4(-0.635,-2.6) 5(0.635,-2.6) 6(1.905,-2.6) 7(3.175,-2.6) 8(4.445,-2.6) 9(4.445,2.6) 10(3.175,2.6) 11(1.905,2.6) 12(0.635,2.6) 13(-0.635,2.6) 14(-1.905,2.6) 15(-3.175,2.6) 16(-4.445,2.6)
  silkscreen extent -5.42,-2.72 5,1.1
SOP-8 [mil]
  oval 80x24 smd: 1(0,0) 2(0,-50) 3(0,-100) 4(0,-150) 5(220,-150) 6(220,-100) 7(220,-50) 8(220,0)
  silkscreen extent 60,-175 160,25
SOT-23-3_L2.9-W1.3-P1.90-LS2.4-BR [mm]
  rect 1x0.65 smd: 1(1,-0.95) 2(1,0.95) 3(-1,0)
  silkscreen extent -0.73,-1.53 0.73,1.53
SOT-23-5_L2.9-W1.6-P0.95-LS2.8-BL [mm]
  rect 0.6x1 smd paste+0 mask+0.05: 1(-0.95,-1.1) 2(0,-1.1) 3(0.95,-1.1) 4(0.95,1.1) 5(-0.95,1.1)
  silkscreen extent -1.52,-0.7 1.4,0.89
SOT-23-5_L3.0-W1.7-P0.95-LS2.8-BL [mm]
  rect 0.49x1.157 smd: 1(-0.95,-1.154) 2(0,-1.154) 3(0.95,-1.154)
  rect 0.49x1.175 smd: 4(0.95,1.154) 5(-0.95,1.154)
  silkscreen extent -1.8,-1.29 1.53,0.85
SOT-23-5_L3.0-W1.7-P0.95-LS2.8-BR [mil]
  rect 43.3x23.6 smd: 1(51.2,-37.4) 2(51.2,0) 3(51.2,37.4) 4(-51.1,37.4) 5(-51.1,-37.4)
  silkscreen extent -35,-61 36,61
SOT-23-6_L2.9-W1.6-P0.95-LS2.8-BR [mm]
  rect 1.1x0.6 smd paste+0 mask+0.051: 1(1.35,-0.95) 2(1.35,0) 3(1.35,0.95) 4(-1.35,0.95) 5(-1.35,0) 6(-1.35,-0.95)
  silkscreen extent -0.9,-1.78 1.52,1.55
SOT-23_L2.9-W1.3-P1.90-LS2.4-BR [mm]
  rect 1x0.8 smd: 1(1.15,-0.95) 2(1.15,0.95) 3(-1.15,0)
  silkscreen extent -0.7,-1.5 0.7,1.5
SOT-223-3_L6.5-W3.4-P2.30-LS7.0-BR [mm]
  rect 2.5x1.1 smd: 1(2.97,-2.3) 2(2.97,0) 3(2.97,2.3)
  rect 2.34x3.6 smd: 4(-2.97,0)
  silkscreen extent -1.57,-3.33 1.37,3.33
SOT-223-4_L6.5-W3.5-P2.30-LS7.0-BR [mm]
  rect 2.47x0.98 smd: 1(2.835,-2.3) 2(2.835,0) 3(2.835,2.3)
  rect 2.47x3.6 smd: 4(-2.835,0)
  silkscreen extent -1.37,-3.33 1.37,3.33
SW-TH_2MS1T2B2VS2QES [mm]
  round 1.8 hole 1.15: 1(0,-2.54) 2(0,0) 3(0,2.54) 4(0,5.08) 5(0,-5.08)
  silkscreen extent -2.54,-5.08 2.54,5.08
TEST [mm]
  round 1.5 smd: 1(0,0)
"TSW SMD-6*6*4.3" [mm] "6*6*4.3mm"
  rect 2.7x1 smd: 1(-4.4,2.261)
  oval 2.7x1 smd: 2(-4.4,-2.239) 3(4.4,-2.239) 4(4.4,2.261)
  silkscreen extent -2.79,-2.79 2.79,2.79, body extent -4.5,-3 4.5,3, height 4.25